# Altium PCB PS-25-001-E-01.PcbDoc (part 1 of 3)
Units mm, origin at the board's own origin, x right, y up, seen from the top; angles counter-clockwise.
Board outline 120 x 60 mm, 4 copper layers (01_Top, 02_Plane, 03_Plane, 04_Bottom), stack 1.578 mm thick; 526 components, 249 nets, 1738 pads, 748 vias.
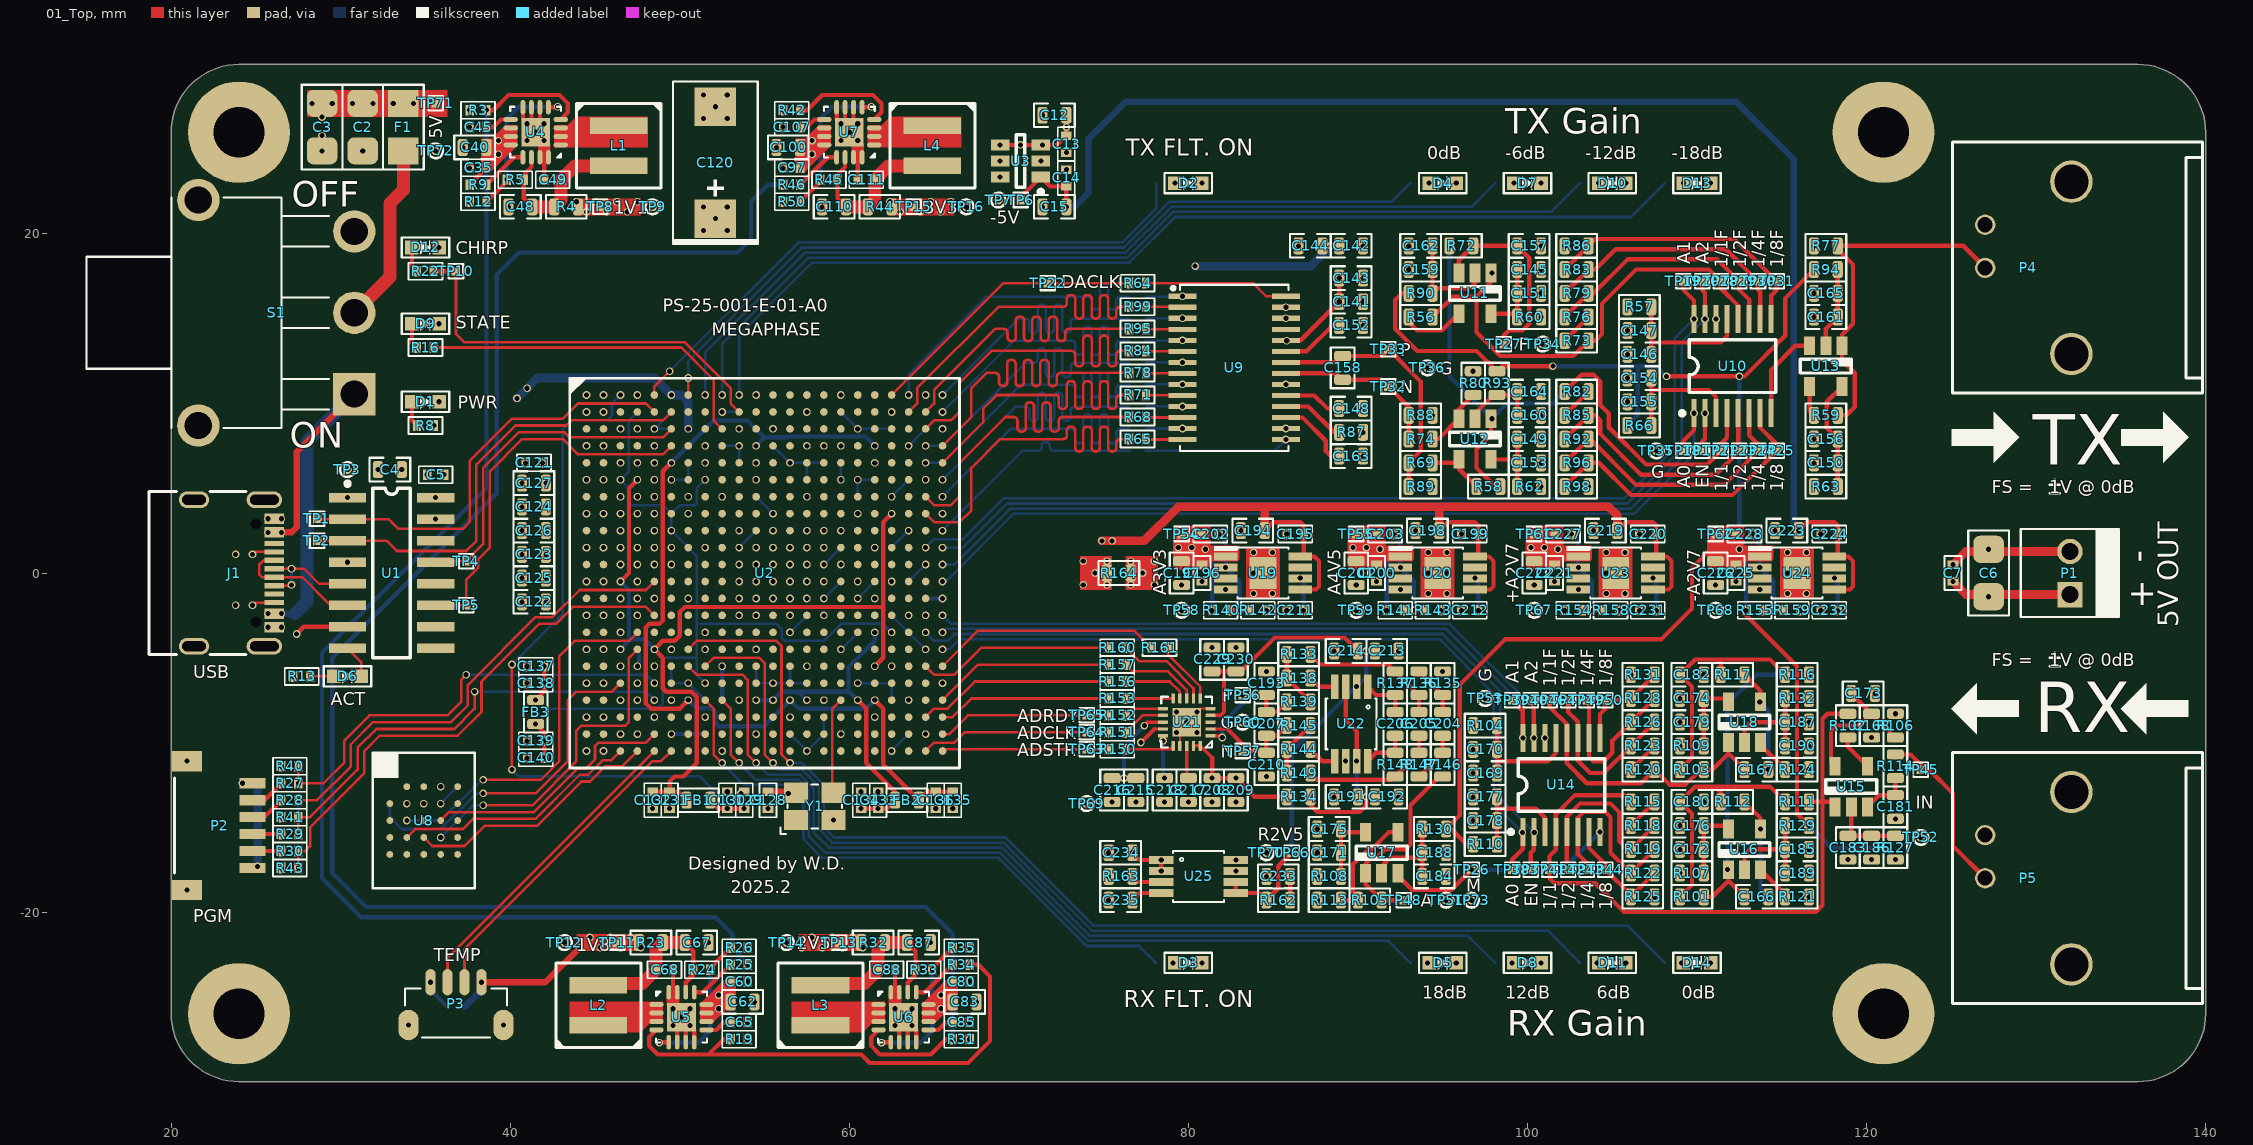
[diagram p0: 01_Top view]
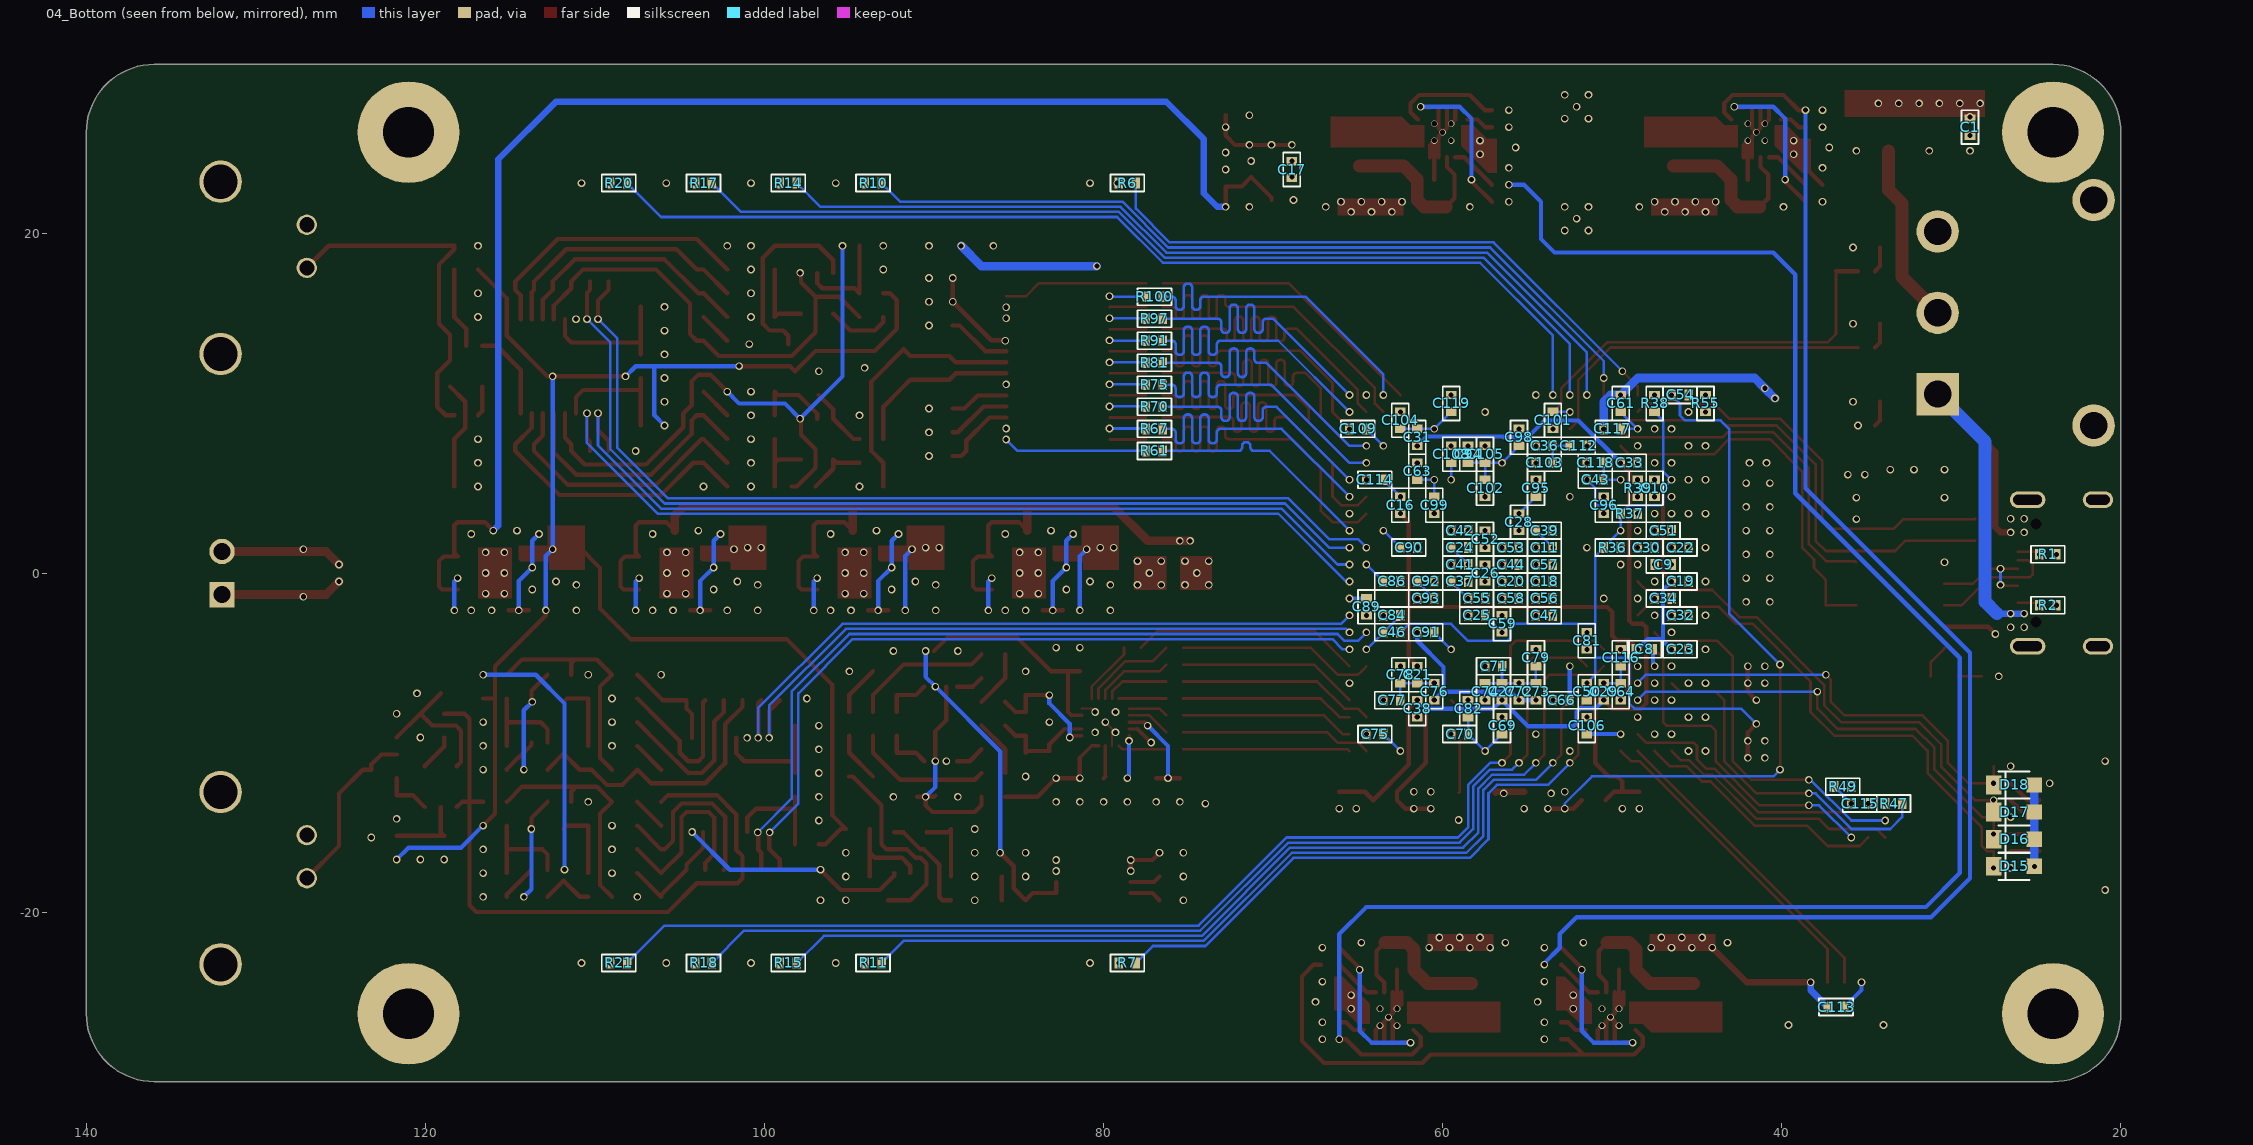
[diagram p1: 04_Bottom view, seen from below]
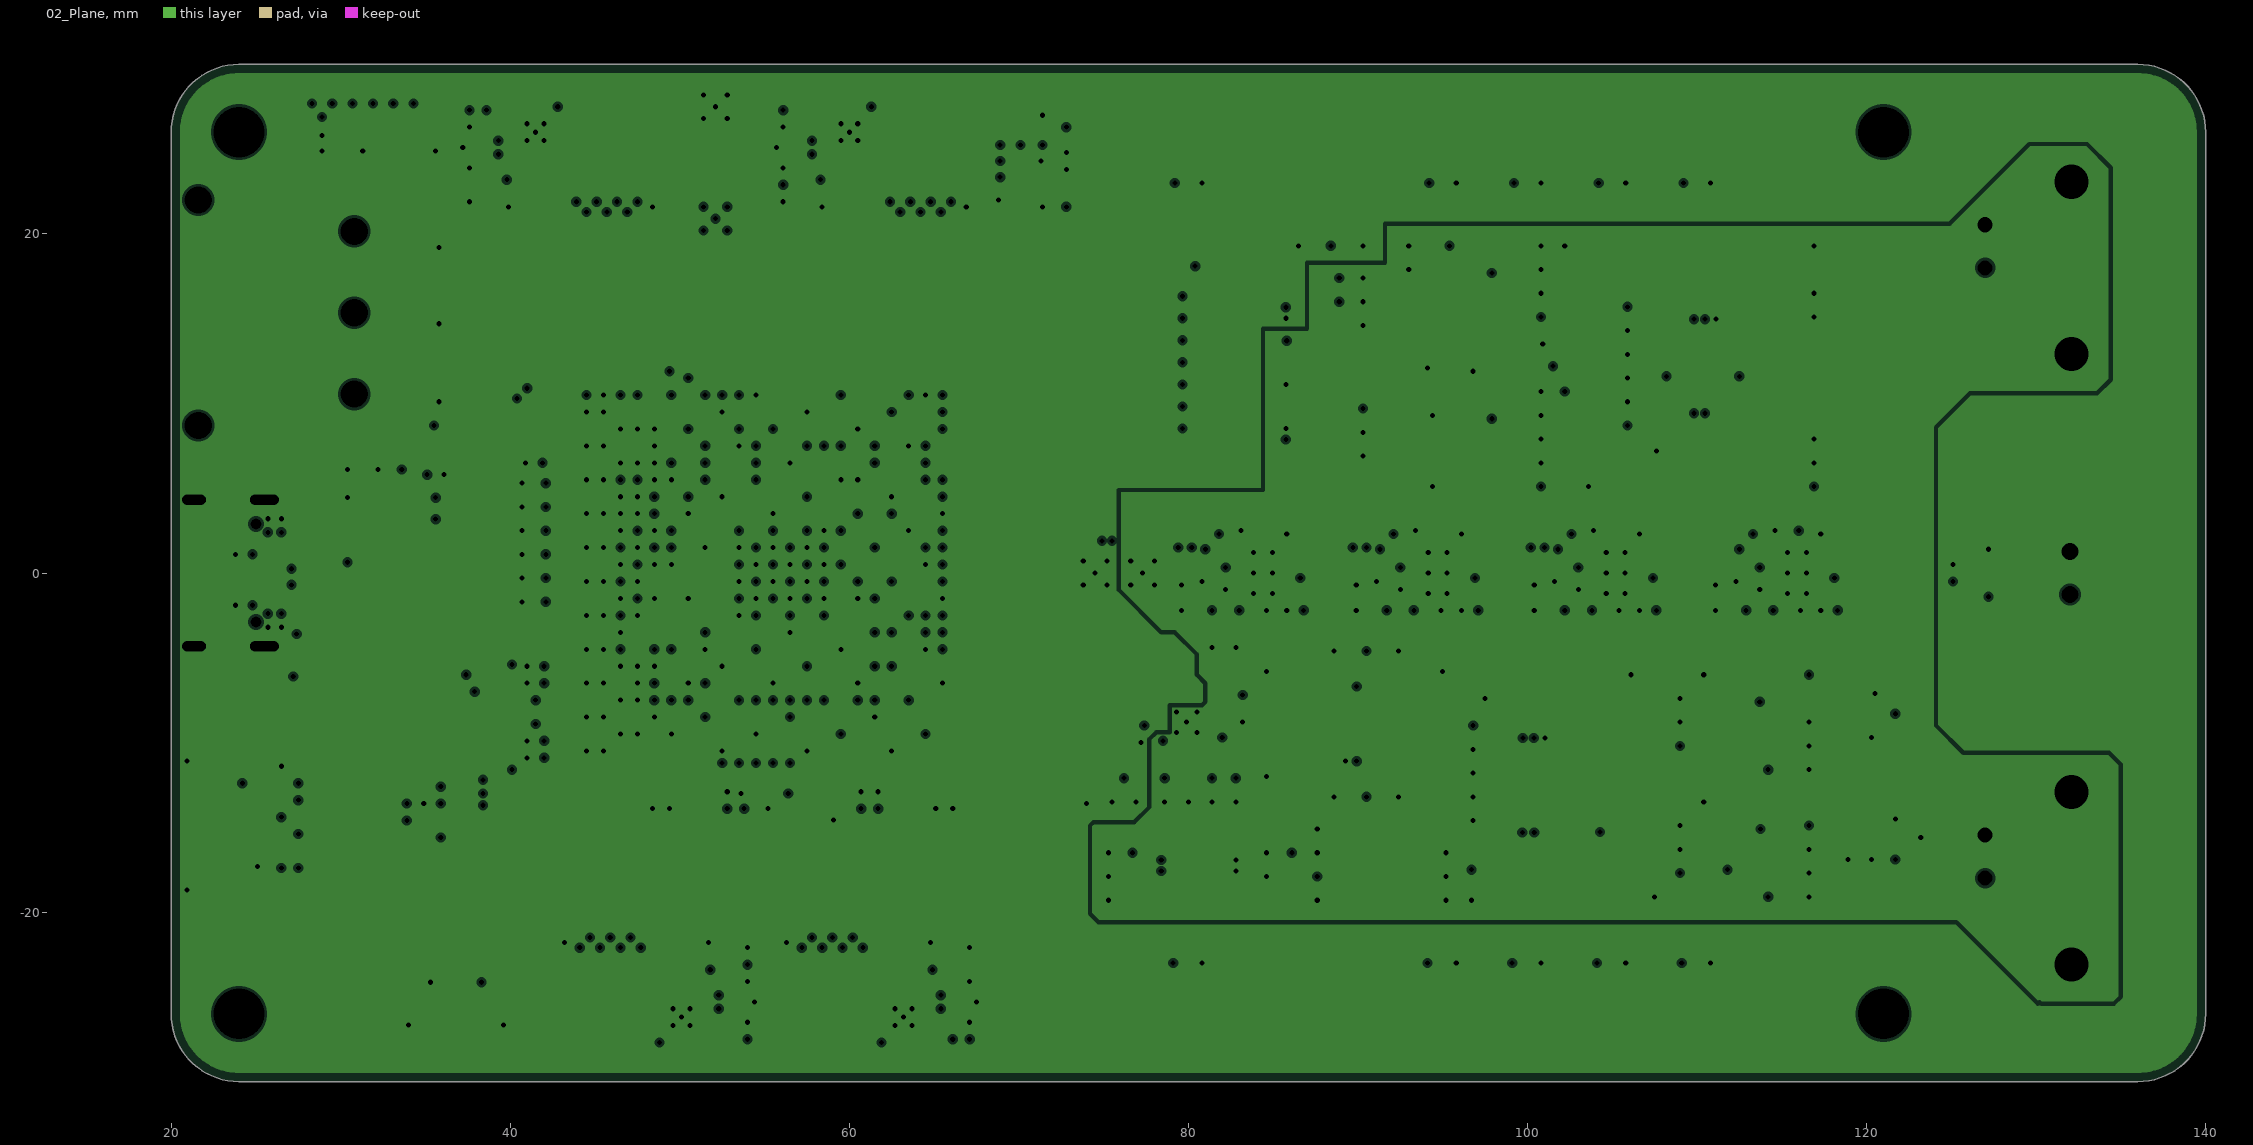
[diagram p2: 02_Plane, clearances drawn from the general rule]
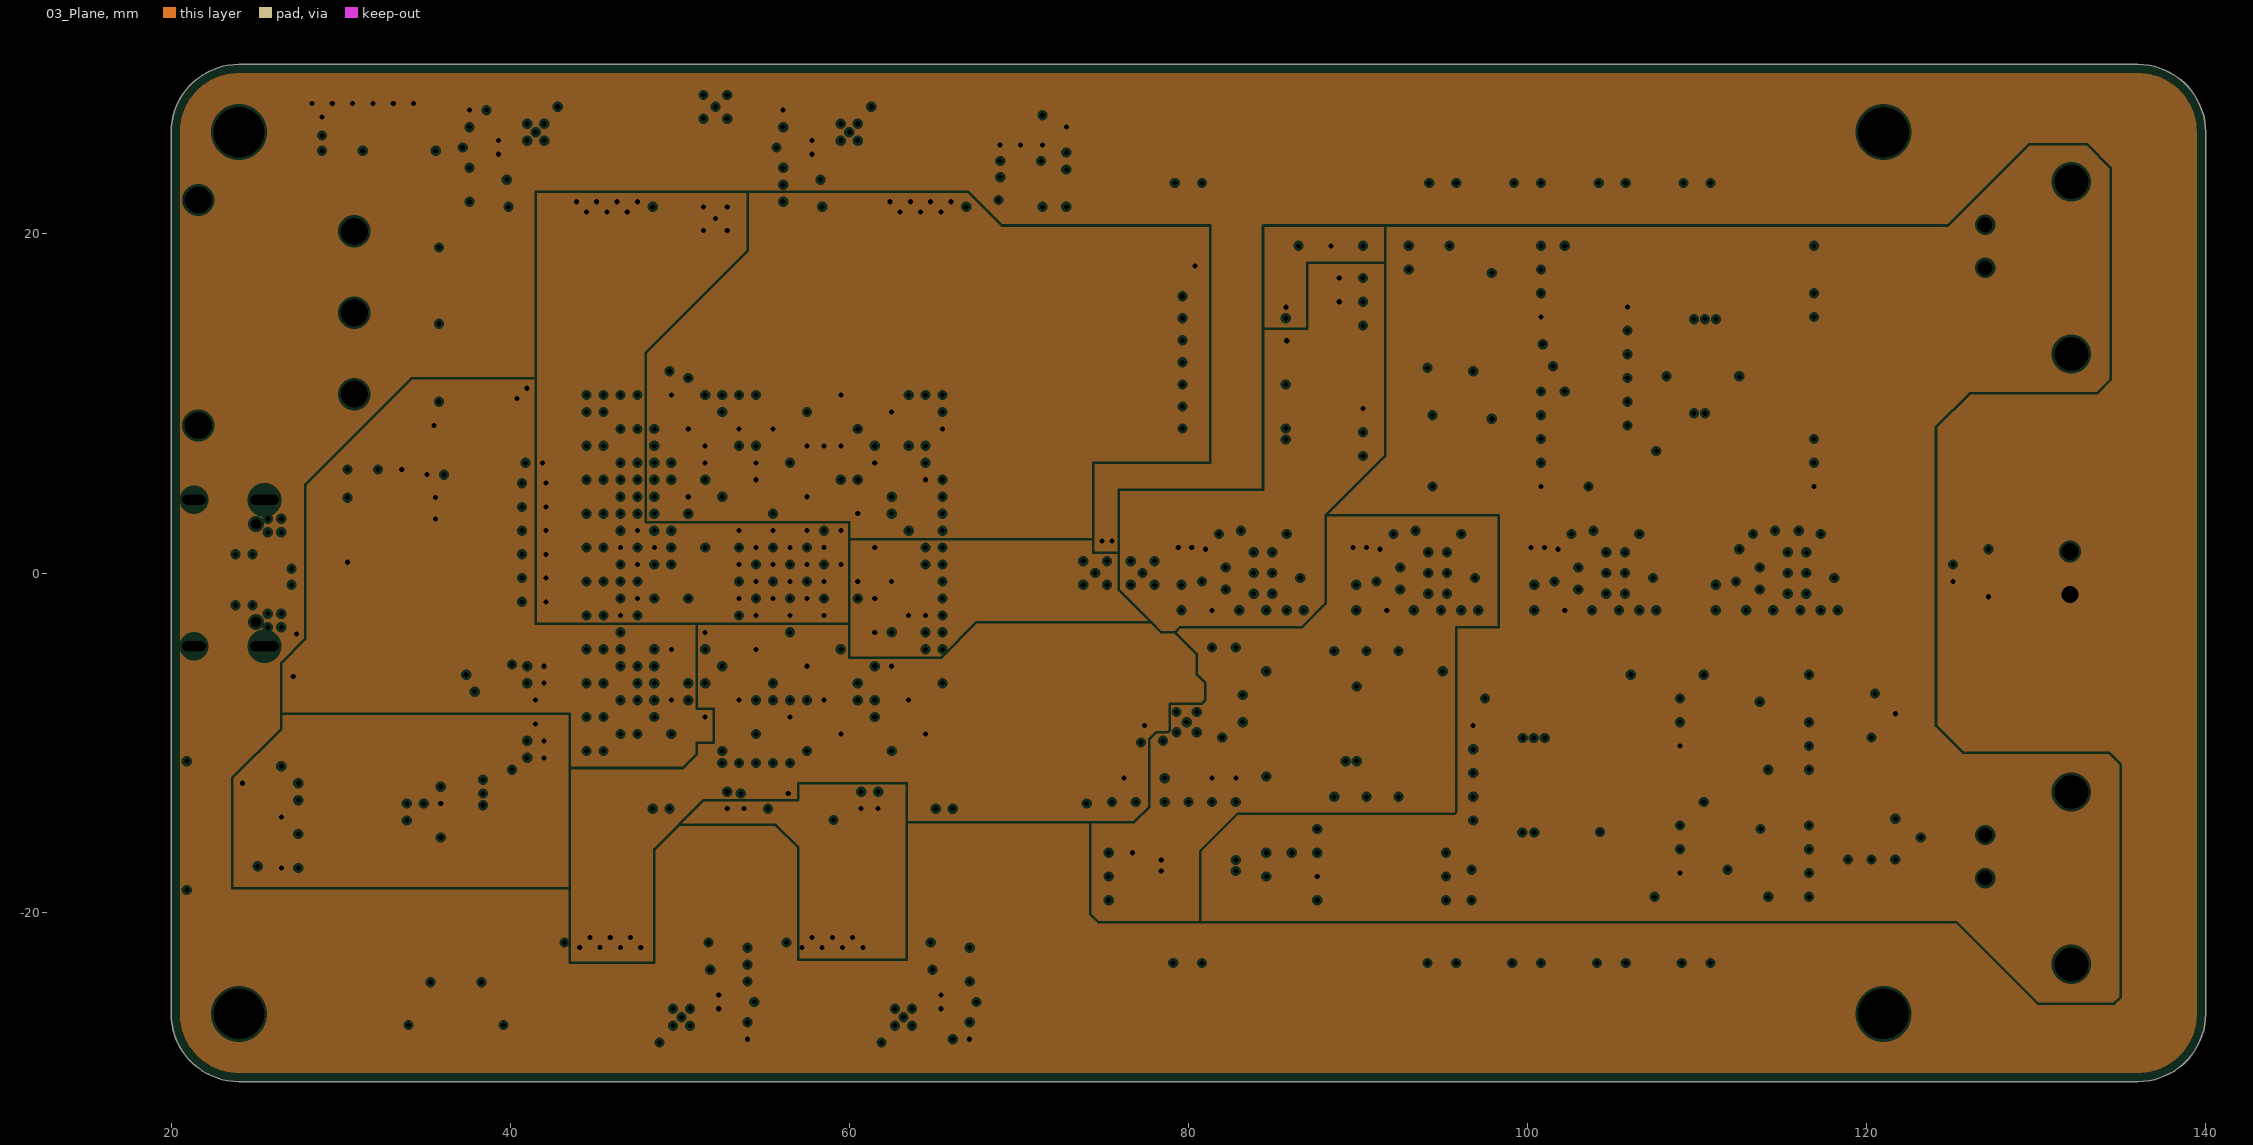
[diagram p3: 03_Plane, clearances drawn from the general rule]
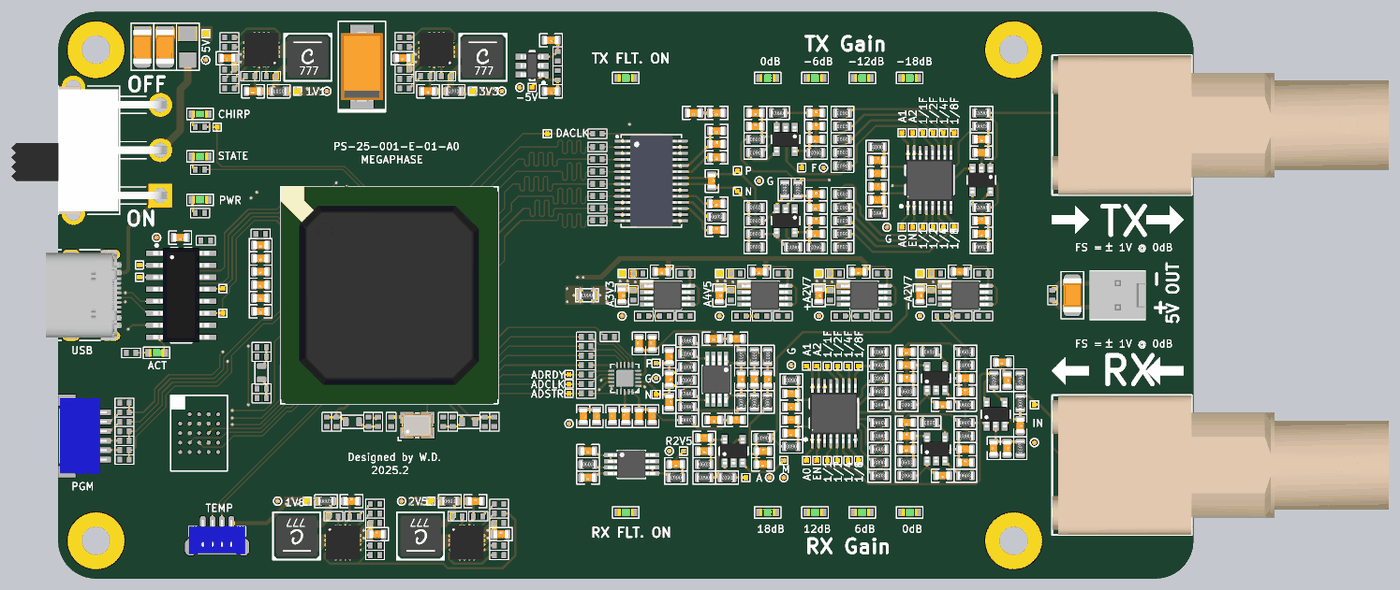
[diagram p6: 3D render of the assembled board from above, using the file's embedded part models]

## Layer stack, top to bottom
Top Solder: solder mask 0.0102, Solder Resist, Dk 3.5
01_Top: signal copper 0.0356
Dielectric 1: core 0.254, FR-4, Dk 4.2
02_Plane: plane copper 0.036, net (Multiple Nets)
Dielectric 3: prepreg 0.927, Dk 4.2
03_Plane: plane copper 0.036, net (Multiple Nets)
Dielectric 4: core 0.254, Dk 4.2
04_Bottom: signal copper 0.0356
Bottom Solder: solder mask 0.0102, Solder Resist, Dk 3.5

## Board outline
20,-26 20,26 cw(c24,26) 24,30 136,30 cw(c136,26) 140,26 140,-26 cw(c136,-26) 136,-30 24,-30 cw(c24,-26)

## Design rules (kind name [scope] priority, off if disabled: settings)
Clearance [All] p1: gap=0.102
ComponentClearance [All] p1 off: gap=0.254 collisioncheckmode=3 verticalgap=0.254 showdistances=FALSE
HoleSize [All] p1: absolutevalues=TRUE maxlimit=10 minlimit=0.025 maxpercent=80.000 minpercent=20.000
MinimumSolderMaskSliver [All] p1 off: minsoldermaskwidth=0.254
PlaneClearance [All] p1: clearance=0.152
PlaneConnect [All] p1: planeconnectstyle=Direct reliefexpansion=0.508 reliefentries=4 reliefconductorwidth=0.254 reliefairgap=0.254
PolygonConnect [All] p1: connectstyle=Direct reliefconductorwidth=0.254 reliefentries=4 polygonreliefangle="90 Angle" airgapwidth=0.254
RoutingVias [All] p1: holewidth=0.3 width=0.45 viastyle="Through Hole" minholewidth=0.2 minwidth=0.3 maxholewidth=1 maxwidth=2
SilkToSilkClearance [All] p1 off: silktosilkclearance=0.254
SilkToSolderMaskClearance [IsPad] p1 off: minsilkscreentomaskgap=0.254 clearancetoexposedcopper=TRUE
SolderMaskExpansion [All] p1: expansion=0.102
Width [All] p1: maxlimit=5.08 minlimit=0.102 preferedwidth=0.254
23 further rules are at their usual default settings.

## Classes and differential pairs
component class 01_Power: C1 C2 C3 C4 C5 C6 C7 C8 C9 C10 C11 C12 C13 C14 C15 C16 C17 C18 C19 C20 C21 C22 C23 C24 C25 C26 C27 C28 C29 C30 C31 C32 C33 C34 C35 C36 C37 C38 C39 C40 C41 C42 C43 C44 C45 C46 C47 C48 C49 C50 C51 C52 C53 C54 C55 C56 C57 C58 C59 C60 C61 C62 C63 C64 C65 C66 C67 C68 C69 C70 C71 C72 C73 C74 C75 C76 C77 C78 C79 C80 C81 C82 C83 C84 C85 C86 C87 C88 C89 C90 C91 C92 C93 C94 C95 C96 C97 C98 C99 C100 C101 C102 C103 C104 C105 C106 C107 C108 C109 C110 C111 C112 C113 C114 C115 C116 C117 C118 C119 C120 C121 C122 C123 C124 C125 C126 C127 C128 C129 C130 C131 C132 C133 C134 C135 C136 C137 C138 C139 C140 D1 D2 D3 D4 D5 D6 D7 D8 D9 D10 D11 D12 D13 D14 D15 D16 D17 D18 F1 FB1 FB2 FB3 J1 L1 L2 L3 L4 P1 P2 P3 R1 R2 R3 R4 R5 R6 R7 R8 R9 R10 R11 R12 R13 R14 R15 R16 R17 R18 R19 R20 R21 R22 R23 R24 R25 R26 R27 R28 R29 R30 R31 R32 R33 R34 R35 R36 R37 R38 R39 R40 R41 R42 R43 R44 R45 R46 R47 R49 R50 R55 S1 TP1 TP2 TP3 TP4 TP5 TP6 TP7 TP8 TP9 TP10 TP11 TP12 TP13 TP14 TP15 TP16 TP71 TP72 U1 U3 U4 U5 U6 U7 U8 Y1
component class 02_Analog: C141 C142 C143 C144 C145 C146 C147 C148 C149 C150 C151 C152 C153 C154 C155 C156 C157 C158 C159 C160 C161 C162 C163 C164 C165 C166 C167 C168 C169 C170 C171 C172 C173 C174 C175 C176 C177 C178 C179 C180 C181 C182 C183 C184 C185 C186 C187 C188 C189 C190 C191 C192 C193 C194 C195 C196 C197 C198 C199 C200 C201 C202 C203 C204 C205 C206 C207 C208 C209 C210 C211 C212 C213 C214 C215 C216 C217 C218 C219 C220 C221 C222 C223 C224 C225 C226 C227 C228 C229 C230 C231 C232 C233 C234 C235 P4 P5 R56 R57 R58 R59 R60 R61 R62 R63 R64 R65 R66 R67 R68 R69 R70 R71 R72 R73 R74 R75 R76 R77 R78 R79 R80 R81 R82 R83 R84 R85 R86 R87 R88 R89 R90 R91 R92 R93 R94 R95 R96 R97 R98 R99 R100 R101 R102 R103 R104 R105 R106 R107 R108 R109 R110 R111 R112 R113 R114 R115 R116 R117 R118 R119 R120 R121 R122 R123 R124 R125 R126 R127 R128 R129 R130 R131 R132 R133 R134 R135 R136 R137 R138 R139 R140 R141 R142 R143 R144 R145 R146 R147 R148 R149 R150 R151 R152 R153 R154 R155 R156 R157 R158 R159 R160 R161 R162 R163 R164 TP17 TP18 TP19 TP20 TP21 TP22 TP23 TP24 TP25 TP26 TP27 TP28 TP29 TP30 TP31 TP32 TP33 TP34 TP35 TP36 TP37 TP38 TP39 TP40 TP41 TP42 TP43 TP44 TP45 TP46 TP47 TP48 TP49 TP50 TP51 TP52 TP53 TP54 TP55 TP56 TP57 TP58 TP59 TP60 TP61 TP62 TP63 TP64 TP65 TP66 TP67 TP68 TP69 TP70 TP73 U9 U10 U11 U12 U13 U14 U15 U16 U17 U18 U19 U20 U21 U22 U23 U24 U25
component class 03_IO: U2
net class DA_DATA: DA_CLK DA_D0 DA_D1 DA_D2 DA_D3 DA_D4 DA_D5 DA_D6 DA_D7 DA_D8 DA_D9 DA_D10 DA_D11 DA_D12 DA_D13 DA_PD

## Components (designator, comment, footprint, x,y, rotation, side; value= is the part's Value field where it differs from the comment)
C1 "0.1uF" 1005[0402]CAP 28.9,26.3 r90 bottom
C2 "220uF/6.3V  1206" 1206CAP 31.3,26.3 r90 top
C3 "220uF/6.3V  1206" 1206CAP 28.9,26.3 r90 top
C4 "10uF/10V 0603" 1608[0603]CAP 32.9,6.1 r180 top
C5 "0.1uF" 1005[0402]CAP 35.6,5.8 r180 top
C6 "220uF/6.3V  1206" 1206CAP 127.2,0 r270 top
C7 "0.1uF" 1005[0402]CAP 125.1,0 r270 top
C8 "0.1uF" 1005[0402]CAP 48.1,-4.5 r0 bottom
C9 "0.1uF" 1005[0402]CAP 47,0.5 r0 bottom
C10 "0.1uF" 1005[0402]CAP 47.5,5 r90 bottom
C11 "0.1uF" 1005[0402]CAP 54,1.5 r0 bottom
C12 "22uF/10V 0603" 1608[0603]CAP 72.1,27 r180 top
C13 "0.1uF" 1005[0402]CAP 72.8,25.3 r90 top
C14 "0.1uF" 1005[0402]CAP 72.8,23.3 r270 top
C15 "22uF/10V 0603" 1608[0603]CAP 72.1,21.6 r180 top
C16 "0.1uF" 1005[0402]CAP 62.5,4 r270 bottom
C17 "1uF" 1005[0402]CAP 68.9,23.8 r90 bottom
C18 "0.1uF" 1005[0402]CAP 54,-0.5 r0 bottom
C19 "0.1uF" 1005[0402]CAP 46,-0.5 r0 bottom
C20 "0.1uF" 1005[0402]CAP 56,-0.5 r0 bottom
C21 "0.1uF" 1005[0402]CAP 61.5,-6 r90 bottom
C22 "0.1uF" 1005[0402]CAP 46,1.5 r0 bottom
C23 "0.1uF" 1005[0402]CAP 46,-4.5 r0 bottom
C24 "0.1uF" 1005[0402]CAP 59,1.5 r180 bottom
C25 "0.1uF" 1005[0402]CAP 58,-2.5 r0 bottom
C26 "0.1uF" 1005[0402]CAP 57.5,0 r90 bottom
C27 "0.1uF" 1005[0402]CAP 56.5,-7 r270 bottom
C28 "0.1uF" 1005[0402]CAP 55.5,3 r270 bottom
C29 "0.1uF" 1005[0402]CAP 50.5,-7 r270 bottom
C30 "0.1uF" 1005[0402]CAP 48,1.5 r0 bottom
C31 "0.1uF" 1005[0402]CAP 61.5,8 r270 bottom
C32 "0.1uF" 1005[0402]CAP 46,-2.5 r0 bottom
C33 "0.1uF" 1005[0402]CAP 49,6.5 r0 bottom
C34 "0.1uF" 1005[0402]CAP 47,-1.5 r0 bottom
C35 "0.1uF" 1005[0402]CAP 38.1,23.9 r180 top
C36 "0.1uF" 1005[0402]CAP 54,7.5 r0 bottom
C37 "0.1uF" 1005[0402]CAP 59,-0.5 r180 bottom
C38 "0.1uF" 1005[0402]CAP 61.5,-8 r90 bottom
C39 "0.1uF" 1005[0402]CAP 54,2.5 r180 bottom
C40 "10uF/10V 0603" 1608[0603]CAP 37.9,25.1 r180 top
C41 "0.1uF" 1005[0402]CAP 59,0.5 r0 bottom
C42 "0.1uF" 1005[0402]CAP 59,2.5 r0 bottom
C43 "0.1uF" 1005[0402]CAP 51,5.5 r0 bottom
C44 "0.1uF" 1005[0402]CAP 56,0.5 r180 bottom
C45 "3.3nF" 1005[0402]CAP 38.1,26.3 r180 top
C46 "0.1uF" 1005[0402]CAP 63,-3.5 r180 bottom
C47 "0.1uF" 1005[0402]CAP 54,-2.5 r0 bottom
C48 "22uF/10V 0603" 1608[0603]CAP 40.6,21.6 r180 top
C49 "0.1uF" 1005[0402]CAP 42.5,23.2 r0 top
C50 "0.1uF" 1005[0402]CAP 51.5,-7 r90 bottom
C51 "0.1uF" 1005[0402]CAP 47,2.5 r0 bottom
C52 "0.1uF" 1005[0402]CAP 57.5,2 r90 bottom
C53 "0.1uF" 1005[0402]CAP 56,1.5 r0 bottom
C54 "0.1uF" 1005[0402]CAP 46,10.5 r0 bottom
C55 "0.1uF" 1005[0402]CAP 58,-1.5 r180 bottom
C56 "0.1uF" 1005[0402]CAP 54,-1.5 r180 bottom
C57 "0.1uF" 1005[0402]CAP 54,0.5 r180 bottom
C58 "0.1uF" 1005[0402]CAP 56,-1.5 r180 bottom
C59 "0.1uF" 1005[0402]CAP 56.5,-3 r90 bottom
C60 "0.1uF" 1005[0402]CAP 53.5,-24.1 r0 top
C61 "0.1uF" 1005[0402]CAP 49.5,10 r90 bottom
C62 "10uF/10V 0603" 1608[0603]CAP 53.7,-25.3 r0 top
C63 "0.1uF" 1005[0402]CAP 61.5,6 r90 bottom
C64 "0.1uF" 1005[0402]CAP 49.5,-7 r270 bottom
C65 "3.3nF" 1005[0402]CAP 53.5,-26.5 r0 top
C66 "0.1uF" 1005[0402]CAP 53,-7.5 r0 bottom
C67 "22uF/10V 0603" 1608[0603]CAP 51,-21.8 r0 top
C68 "0.1uF" 1005[0402]CAP 49.1,-23.4 r180 top
C69 "0.1uF" 1005[0402]CAP 56.5,-9 r90 bottom
C70 "0.1uF" 1005[0402]CAP 59,-9.5 r0 bottom
C71 "0.1uF" 1005[0402]CAP 57,-5.5 r0 bottom
C72 "0.1uF" 1005[0402]CAP 55.5,-7 r270 bottom
C73 "0.1uF" 1005[0402]CAP 54.5,-7 r270 bottom
C74 "0.1uF" 1005[0402]CAP 57.5,-7 r270 bottom
C75 "0.1uF" 1005[0402]CAP 64,-9.5 r0 bottom
C76 "0.1uF" 1005[0402]CAP 60.5,-7 r270 bottom
C77 "0.1uF" 1005[0402]CAP 63,-7.5 r0 bottom
C78 "0.1uF" 1005[0402]CAP 62.5,-6 r90 bottom
C79 "0.1uF" 1005[0402]CAP 54.5,-5 r90 bottom
C80 "0.1uF" 1005[0402]CAP 66.6,-24.1 r0 top
C81 "0.1uF" 1005[0402]CAP 51.5,-4 r90 bottom
C82 "0.1uF" 1005[0402]CAP 58.5,-8 r90 bottom
C83 "10uF/10V 0603" 1608[0603]CAP 66.8,-25.3 r0 top
C84 "0.1uF" 1005[0402]CAP 63,-2.5 r0 bottom
C85 "3.3nF" 1005[0402]CAP 66.6,-26.5 r0 top
C86 "0.1uF" 1005[0402]CAP 63,-0.5 r180 bottom
C87 "22uF/10V 0603" 1608[0603]CAP 64.1,-21.8 r0 top
C88 "0.1uF" 1005[0402]CAP 62.2,-23.4 r180 top
C89 "0.1uF" 1005[0402]CAP 64.5,-2 r270 bottom
C90 "0.1uF" 1005[0402]CAP 62,1.5 r180 bottom
C91 "0.1uF" 1005[0402]CAP 61,-3.5 r0 bottom
C92 "0.1uF" 1005[0402]CAP 61,-0.5 r180 bottom
C93 "0.1uF" 1005[0402]CAP 61,-1.5 r0 bottom
C94 "0.1uF" 1005[0402]CAP 58.5,7 r90 bottom
C95 "0.1uF" 1005[0402]CAP 54.5,5 r90 bottom
C96 "0.1uF" 1005[0402]CAP 50.5,4 r90 bottom
C97 "0.1uF" 1005[0402]CAP 56.6,23.9 r180 top
C98 "0.1uF" 1005[0402]CAP 55.5,8 r90 bottom
C99 "0.1uF" 1005[0402]CAP 60.5,4 r270 bottom
C100 "10uF/10V 0603" 1608[0603]CAP 56.4,25.1 r180 top
C101 "0.1uF" 1005[0402]CAP 53.5,9 r270 bottom
C102 "0.1uF" 1005[0402]CAP 57.5,5 r270 bottom
C103 "0.1uF" 1005[0402]CAP 54,6.5 r0 bottom
C104 "0.1uF" 1005[0402]CAP 62.5,9 r90 bottom
C105 "0.1uF" 1005[0402]CAP 57.5,7 r90 bottom
C106 "0.1uF" 1005[0402]CAP 51.5,-9 r90 bottom
C107 "3.3nF" 1005[0402]CAP 56.6,26.3 r180 top
C108 "0.1uF" 1005[0402]CAP 59.5,7 r90 bottom
C109 "0.1uF" 1005[0402]CAP 65,8.5 r0 bottom
C110 "22uF/10V 0603" 1608[0603]CAP 59.1,21.6 r180 top
C111 "0.1uF" 1005[0402]CAP 61,23.2 r0 top
C112 "0.1uF" 1005[0402]CAP 52,7.5 r180 bottom
C113 "0.1uF" 1005[0402]CAP 36.8,-25.6 r0 bottom
C114 "0.1uF" 1005[0402]CAP 64,5.5 r0 bottom
C115 "0.1uF" 1005[0402]CAP 35.4,-13.6 r0 bottom
C116 "0.1uF" 1005[0402]CAP 49.5,-5 r90 bottom
C117 "0.1uF" 1005[0402]CAP 50,8.5 r0 bottom
C118 "0.1uF" 1005[0402]CAP 51,6.5 r0 bottom
C119 "0.1uF" 1005[0402]CAP 59.5,10 r90 bottom
C120 "EEFGX0E471R" TE 52.1,24.2 r90 top
C121 "0.1uF" 1005[0402]CAP 41.4,6.5 r0 top
C122 "10uF/10V 0603" 1608[0603]CAP 41.4,-1.7 r180 top
C123 "10uF/10V 0603" 1608[0603]CAP 41.4,1.1 r180 top
C124 "10uF/10V 0603" 1608[0603]CAP 41.4,3.9 r180 top
C125 "10uF/10V 0603" 1608[0603]CAP 41.4,-0.3 r180 top
C126 "10uF/10V 0603" 1608[0603]CAP 41.4,2.5 r180 top
C127 "10uF/10V 0603" 1608[0603]CAP 41.4,5.3 r180 top
C128 "0.1uF" 1005[0402]CAP 55.2,-13.4 r270 top
C129 "1uF/10V" 1005[0402]CAP 53.8,-13.4 r90 top
C130 "0.1uF" 1005[0402]CAP 52.8,-13.4 r270 top
C131 "1uF/10V" 1005[0402]CAP 49.4,-13.4 r270 top
C132 "0.1uF" 1005[0402]CAP 48.4,-13.4 r90 top
C133 "1uF/10V" 1005[0402]CAP 61.7,-13.4 r90 top
C134 "0.1uF" 1005[0402]CAP 60.7,-13.4 r270 top
C135 "1uF/10V" 1005[0402]CAP 66.1,-13.4 r270 top
C136 "0.1uF" 1005[0402]CAP 65.1,-13.4 r90 top
C137 "1uF/10V" 1005[0402]CAP 41.5,-5.5 r180 top
C138 "0.1uF" 1005[0402]CAP 41.5,-6.5 r0 top
C139 "1uF/10V" 1005[0402]CAP 41.5,-9.9 r180 top
C140 "0.1uF" 1005[0402]CAP 41.5,-10.9 r0 top
C141 "10uF/10V 0603" 1608[0603]CAP 89.6,16 r0 top
C142 "10uF/10V 0603" 1608[0603]CAP 89.6,19.3 r180 top
C143 "0.1uF 0603" 1608[0603]CAP 89.6,17.4 r180 top
C144 "0.1uF 0603" 1608[0603]CAP 87.2,19.3 r180 top
C145 "10uF/10V 0603" 1608[0603]CAP 100.1,17.9 r0 top
C146 "0.1uF 0603" 1608[0603]CAP 106.6,12.9 r180 top
C147 "10uF/10V 0603" 1608[0603]CAP 106.6,14.3 r0 top
C148 "0.1uF 0603" 1608[0603]CAP 89.6,9.7 r180 top
C149 "10uF/10V 0603" 1608[0603]CAP 100.1,7.9 r0 top
C150 "10uF/10V 0603" 1608[0603]CAP 117.6,6.5 r180 top
C151 "0.1uF 0603" 1608[0603]CAP 100.1,16.5 r180 top
C152 "0.1uF 0603" 1608[0603]CAP 89.6,14.6 r180 top
C153 "0.1uF 0603" 1608[0603]CAP 100.1,6.5 r180 top
C154 "0.1uF 0603" 1608[0603]CAP 106.6,11.5 r0 top
C155 "10uF/10V 0603" 1608[0603]CAP 106.6,10.1 r180 top
C156 "0.1uF 0603" 1608[0603]CAP 117.6,7.9 r0 top
C157 "1nF 0603" 1608[0603]CAP 100.1,19.3 r0 top
C158 "DNI" 1608[0603]CAP 89.1,12.1 r270 top
C159 "0.1uF 0603" 1608[0603]CAP 93.7,17.9 r0 top
C160 "0.1uF 0603" 1608[0603]CAP 100.1,9.3 r180 top
C161 "0.1uF 0603" 1608[0603]CAP 117.6,15.1 r0 top
C162 "10uF/10V 0603" 1608[0603]CAP 93.7,19.3 r180 top
C163 "0.1uF 0603" 1608[0603]CAP 89.6,6.9 r0 top
C164 "10uF/10V 0603" 1608[0603]CAP 100.1,10.7 r0 top
C165 "10uF/10V 0603" 1608[0603]CAP 117.6,16.5 r180 top
C166 "5.1nF C0G 0603" 1608[0603]CAP 113.5,-19.1 r180 top
C167 "5.1nF C0G 0603" 1608[0603]CAP 113.5,-11.6 r180 top
C168 "10uF/10V 0603" 1608[0603]CAP 120.3,-9 r270 top
C169 "0.1uF 0603" 1608[0603]CAP 97.5,-11.8 r180 top
C170 "10uF/10V 0603" 1608[0603]CAP 97.5,-10.4 r0 top
C171 "10uF/10V 0603" 1608[0603]CAP 88.3,-16.5 r180 top
C172 "10uF/10V 0603" 1608[0603]CAP 109.7,-16.3 r180 top
C173 "0.1uF 0603" 1608[0603]CAP 119.8,-7.1 r180 top
C174 "10uF/10V 0603" 1608[0603]CAP 109.7,-7.4 r180 top
C175 "0.1uF 0603" 1608[0603]CAP 88.3,-15.1 r0 top
C176 "0.1uF 0603" 1608[0603]CAP 109.7,-14.9 r0 top
C177 "0.1uF 0603" 1608[0603]CAP 97.5,-13.2 r0 top
C178 "10uF/10V 0603" 1608[0603]CAP 97.5,-14.6 r180 top
C179 "0.1uF 0603" 1608[0603]CAP 109.7,-8.8 r0 top
C180 "24nF C0G 0603" 1608[0603]CAP 109.7,-13.5 r180 top
C181 "DNI" 1608[0603]CAP 121.7,-13.8 r270 top
C182 "24nF C0G 0603" 1608[0603]CAP 109.7,-6 r180 top
C183 "0.1uF 0603" 1608[0603]CAP 118.9,-16.2 r90 top
C184 "0.1uF 0603" 1608[0603]CAP 94.5,-17.9 r180 top
C185 "0.1uF 0603" 1608[0603]CAP 115.9,-16.3 r180 top
C186 "10uF/10V 0603" 1608[0603]CAP 120.3,-16.2 r270 top
C187 "0.1uF 0603" 1608[0603]CAP 115.9,-8.8 r180 top
C188 "10uF/10V 0603" 1608[0603]CAP 94.5,-16.5 r0 top
C189 "10uF/10V 0603" 1608[0603]CAP 115.9,-17.7 r0 top
C190 "10uF/10V 0603" 1608[0603]CAP 115.9,-10.2 r0 top
C191 "0.1uF 0603" 1608[0603]CAP 89.3,-13.2 r180 top
C192 "10uF/10V 0603" 1608[0603]CAP 91.7,-13.2 r0 top
C193 "220pF 0603" 1608[0603]CAP 84.6,-6.5 r270 top
C194 "22uF/10V 0603" 1608[0603]CAP 83.8,2.5 r180 top
C195 "0.1uF" 1005[0402]CAP 86.3,2.3 r0 top
C196 "0.1uF" 1005[0402]CAP 80.8,0 r90 top
C197 "22uF/10V 0603" 1608[0603]CAP 79.6,0 r270 top
C198 "22uF/10V 0603" 1608[0603]CAP 94.1,2.5 r180 top
C199 "0.1uF" 1005[0402]CAP 96.6,2.3 r0 top
C200 "0.1uF" 1005[0402]CAP 91.1,0 r90 top
C201 "22uF/10V 0603" 1608[0603]CAP 89.9,0 r270 top
C202 "10nF" 1005[0402]CAP 81.3,2.3 r180 top
C203 "10nF" 1005[0402]CAP 91.6,2.3 r180 top
C204 "220pF 0603" 1608[0603]CAP 95,-8.9 r270 top
C205 "330pF 0603" 1608[0603]CAP 93.6,-8.9 r270 top
C206 "470pF 0603" 1608[0603]CAP 92.2,-8.9 r270 top
C207 "2.2nF 0603" 1608[0603]CAP 84.6,-8.9 r270 top
C208 "10uF/10V 0603" 1608[0603]CAP 81.4,-12.8 r270 top
C209 "0.1uF 0603" 1608[0603]CAP 82.8,-12.8 r270 top
C210 "220pF 0603" 1608[0603]CAP 84.6,-11.3 r270 top
C211 "10nF" 1005[0402]CAP 86.3,-2.2 r0 top
C212 "10nF" 1005[0402]CAP 96.6,-2.2 r0 top
C213 "10uF/10V 0603" 1608[0603]CAP 91.7,-4.6 r0 top
C214 "0.1uF 0603" 1608[0603]CAP 89.3,-4.6 r180 top
C215 "10uF/10V 0603" 1608[0603]CAP 76.9,-12.8 r270 top
C216 "0.1uF 0603" 1608[0603]CAP 75.5,-12.8 r270 top
C217 "1uF/10V 0603" 1608[0603]CAP 80,-12.8 r90 top
C218 "1uF/10V 0603" 1608[0603]CAP 78.6,-12.8 r90 top
C219 "22uF/10V 0603" 1608[0603]CAP 104.6,2.5 r180 top
C220 "0.1uF" 1005[0402]CAP 107.1,2.3 r0 top
C221 "0.1uF" 1005[0402]CAP 101.6,0 r90 top
C222 "22uF/10V 0603" 1608[0603]CAP 100.4,0 r270 top
C223 "22uF/10V 0603" 1608[0603]CAP 115.3,2.5 r180 top
C224 "0.1uF" 1005[0402]CAP 117.8,2.3 r0 top
C225 "0.1uF" 1005[0402]CAP 112.3,0 r90 top
C226 "22uF/10V 0603" 1608[0603]CAP 111.1,0 r270 top
C227 "10nF" 1005[0402]CAP 102.1,2.3 r180 top
C228 "10nF" 1005[0402]CAP 112.8,2.3 r180 top
C229 "10uF/10V 0603" 1608[0603]CAP 81.4,-5.1 r90 top
C230 "0.1uF 0603" 1608[0603]CAP 82.8,-5.1 r90 top
C231 "10nF" 1005[0402]CAP 107.1,-2.2 r0 top
C232 "10nF" 1005[0402]CAP 117.8,-2.2 r0 top
C233 "22uF/10V 0603" 1608[0603]CAP 85.3,-17.9 r180 top
C234 "10uF/10V 0603" 1608[0603]CAP 76,-16.5 r180 top
C235 "1uF/10V 0603" 1608[0603]CAP 76,-19.3 r180 top
D1 "Yellow Green LED" 1608[0603]LED 35,10.1 r0 top
D2 "Blue LED" 1608[0603]LED 80,23 r0 top
D3 "Blue LED" 1608[0603]LED 80,-23 r0 top
D4 "Yellow Green LED" 1608[0603]LED 95,23 r0 top
D5 "Yellow Green LED" 1608[0603]LED 95,-23 r0 top
D6 "Yellow Green LED" 1608[0603]LED 30.4,-6.1 r0 top
D7 "Yellow Green LED" 1608[0603]LED 100,23 r0 top
D8 "Yellow Green LED" 1608[0603]LED 100,-23 r0 top
D9 "Yellow Green LED" 1608[0603]LED 35,14.7 r0 top
D10 "Yellow Green LED" 1608[0603]LED 105,23 r0 top
D11 "Yellow Green LED" 1608[0603]LED 105,-23 r0 top
D12 "Red LED" 1608[0603]LED 35,19.2 r0 top
D13 "Yellow Green LED" 1608[0603]LED 110,23 r0 top
D14 "Yellow Green LED" 1608[0603]LED 110,-23 r0 top
D15 "DZ2J033M0L" SC-90A 25.1,-17.3 r90 bottom
D16 "DZ2J033M0L" SC-90A 25.1,-15.7 r90 bottom
D17 "DZ2J033M0L" SC-90A 25.1,-14.1 r90 bottom
D18 "DZ2J033M0L" SC-90A 25.1,-12.5 r90 bottom
F1 "BSMD1206C-1200T" 1206 33.7,26.3 r90 top
FB1 "MPZ1608S221A" 1608[0603]FB 51.1,-13.4 r180 top
FB2 "MPZ1608S221A" 1608[0603]FB 63.4,-13.4 r0 top
FB3 "MPZ1608S221A" 1608[0603]FB 41.5,-8.2 r270 top
J1 "KY-TYPE-C-16P" USBTypeC 25,0 r270 top
L1 "XFL4020-222MEB" XFL4020 46.4,25.2 r270 top
L2 "XFL4020-222MEB" XFL4020 45.2,-25.5 r90 top
L3 "XFL4020-222MEB" XFL4020 58.3,-25.5 r90 top
L4 "XFL4020-222MEB" XFL4020 64.9,25.2 r270 top
P1 "Header 2" KEF2510_2P 132,0 r90 top
P2 "BM06B-SRSS-TB" SM06B-SRSS-TB 24.8,-12.4 r270 top
P3 "BM04B-SRSS-TB" BM04B-SRSS-TB 36.8,-25.4 r180 top
P4 "5227661-1" BNC_5227661-1 139.83,18 r270 top
P5 "5227661-1" BNC_5227661-1 139.83,-18 r270 top
R1 "5.1K" 1005[0402]RES 24.3,1.1 r180 bottom
R2 "5.1K" 1005[0402]RES 24.3,-1.9 r0 bottom
R3 "1K" 1005[0402]RES 38.1,27.3 r0 top
R4 "0R 0603" 1608[0603]RES 43.3,21.6 r180 top
R5 "374R" 1005[0402]RES 40.3,23.2 r0 top
R6 "1K" 1005[0402]RES 78.6,23 r180 bottom
R7 "1K" 1005[0402]RES 78.6,-23 r180 bottom
R8 "1K" 1005[0402]RES 35,8.7 r0 top
R9 "10K" 1005[0402]RES 38.1,22.9 r0 top
R10 "1K" 1005[0402]RES 93.6,23 r180 bottom
R11 "1K" 1005[0402]RES 93.6,-23 r180 bottom
R12 "1K" 1005[0402]RES 38.1,21.9 r0 top
R13 "1K" 1005[0402]RES 27.7,-6.1 r180 top
R14 "1K" 1005[0402]RES 98.6,23 r180 bottom
R15 "1K" 1005[0402]RES 98.6,-23 r180 bottom
R16 "1K" 1005[0402]RES 35,13.3 r0 top
R17 "1K" 1005[0402]RES 103.6,23 r180 bottom
R18 "1K" 1005[0402]RES 103.6,-23 r180 bottom
R19 "1K" 1005[0402]RES 53.5,-27.5 r180 top
R20 "1K" 1005[0402]RES 108.6,23 r180 bottom
R21 "1K" 1005[0402]RES 108.6,-23 r180 bottom
R22 "1K" 1005[0402]RES 35,17.8 r0 top
R23 "0R 0603" 1608[0603]RES 48.3,-21.8 r0 top
R24 "1.5K" 1005[0402]RES 51.3,-23.4 r180 top
R25 "10K" 1005[0402]RES 53.5,-23.1 r180 top
R26 "1.2K" 1005[0402]RES 53.5,-22.1 r180 top
R27 "33R" 1005[0402]RES 27,-12.4 r0 top
R28 "33R" 1005[0402]RES 27,-13.4 r0 top
R29 "33R" 1005[0402]RES 27,-15.4 r0 top
R30 "33R" 1005[0402]RES 27,-16.4 r0 top
R31 "1K" 1005[0402]RES 66.6,-27.5 r180 top
R32 "0R 0603" 1608[0603]RES 61.4,-21.8 r0 top
R33 "3.4K" 1005[0402]RES 64.4,-23.4 r180 top
R34 "10K" 1005[0402]RES 66.6,-23.1 r180 top
R35 "1.6K" 1005[0402]RES 66.6,-22.1 r180 top
R36 "10K" 1005[0402]RES 50,1.5 r0 bottom
R37 "10K" 1005[0402]RES 49,3.5 r0 bottom
R38 "10K" 1005[0402]RES 47.5,10 r270 bottom
R39 "10K" 1005[0402]RES 48.5,5 r90 bottom
R40 "1K" 1005[0402]RES 27,-11.4 r180 top
R41 "1K" 1005[0402]RES 27,-14.4 r180 top
R42 "1K" 1005[0402]RES 56.6,27.3 r0 top
R43 "1K" 1005[0402]RES 27,-17.4 r180 top
R44 "0R 0603" 1608[0603]RES 61.8,21.6 r180 top
R45 "3.09K" 1005[0402]RES 58.8,23.2 r0 top
R46 "10K" 1005[0402]RES 56.6,22.9 r0 top
R47 "33.2R" 1005[0402]RES 33.4,-13.6 r0 bottom
R49 "10K" 1005[0402]RES 36.4,-12.6 r180 bottom
R50 "1K" 1005[0402]RES 56.6,21.9 r0 top
R55 "2K" 1005[0402]RES 44.5,10 r90 bottom
R56 "10R 0603" 1608[0603]RES 93.7,15.1 r180 top
R57 "10R 0603" 1608[0603]RES 106.6,15.7 r180 top
R58 "402R 0603" 1608[0603]RES 97.7,5.1 r180 top
R59 "10R 0603" 1608[0603]RES 117.6,9.3 r180 top
R60 "10R 0603" 1608[0603]RES 100.1,15.1 r180 top
R61 "33R" 1005[0402]RES 77,7.2 r180 bottom
R62 "10R 0603" 1608[0603]RES 100.1,5.1 r180 top
R63 "10R 0603" 1608[0603]RES 117.6,5.1 r0 top
R64 "33R" 1005[0402]RES 77,17.1 r180 top
R65 "33R" 1005[0402]RES 77,7.9 r180 top
R66 "10R 0603" 1608[0603]RES 106.6,8.7 r180 top
R67 "33R" 1005[0402]RES 77,8.5 r180 bottom
R68 "33R" 1005[0402]RES 77,9.2 r180 top
R69 "200R 0603" 1608[0603]RES 93.7,6.5 r0 top
R70 "33R" 1005[0402]RES 77,9.8 r180 bottom
R71 "33R" 1005[0402]RES 77,10.5 r180 top
R72 "100R 0603" 1608[0603]RES 96.1,19.3 r180 top
R73 "200R 0603" 1608[0603]RES 102.9,13.7 r180 top
R74 "200R 0603" 1608[0603]RES 93.7,7.9 r0 top
R75 "33R" 1005[0402]RES 77,11.1 r180 bottom
R76 "200R 0603" 1608[0603]RES 102.9,15.1 r0 top
R77 "1K 0603" 1608[0603]RES 117.6,19.3 r180 top
R78 "33R" 1005[0402]RES 77,11.8 r180 top
R79 "200R 0603" 1608[0603]RES 102.9,16.5 r180 top
R80 "402R 0603" 1608[0603]RES 96.8,11.2 r270 top
R81 "33R" 1005[0402]RES 77,12.4 r180 bottom
R82 "200R 0603" 1608[0603]RES 102.9,10.7 r0 top
R83 "100R 0603" 1608[0603]RES 102.9,17.9 r0 top
R84 "33R" 1005[0402]RES 77,13.1 r180 top
R85 "200R 0603" 1608[0603]RES 102.9,9.3 r180 top
R86 "100R 0603" 1608[0603]RES 102.9,19.3 r180 top
R87 "2K 0603" 1608[0603]RES 89.6,8.3 r0 top
R88 "26.1R 0603" 1608[0603]RES 93.7,9.3 r0 top
R89 "28.7R 0603" 1608[0603]RES 93.7,5.1 r0 top
R90 "10R 0603" 1608[0603]RES 93.7,16.5 r0 top
R91 "33R" 1005[0402]RES 77,13.7 r180 bottom
R92 "200R 0603" 1608[0603]RES 102.9,7.9 r0 top
R93 "10R 0603" 1608[0603]RES 98.2,11.2 r270 top
R94 "10R 0603" 1608[0603]RES 117.6,17.9 r0 top
R95 "33R" 1005[0402]RES 77,14.4 r180 top
R96 "100R 0603" 1608[0603]RES 102.9,6.5 r180 top
R97 "33R" 1005[0402]RES 77,15 r180 bottom
R98 "100R 0603" 1608[0603]RES 102.9,5.1 r0 top
R99 "33R" 1005[0402]RES 77,15.7 r180 top
R100 "33R" 1005[0402]RES 77,16.3 r180 bottom
R101 "1K 0603" 1608[0603]RES 109.7,-19.1 r180 top
R102 "10R 0603" 1608[0603]RES 118.9,-9 r270 top
R103 "1K 0603" 1608[0603]RES 109.7,-11.6 r180 top
R104 "10R 0603" 1608[0603]RES 97.5,-9 r180 top
R105 "18.7K 0603" 1608[0603]RES 90.7,-19.3 r180 top
R106 "10R 0603" 1608[0603]RES 121.7,-9 r270 top
R107 "10R 0603" 1608[0603]RES 109.7,-17.7 r0 top
R108 "10R 0603" 1608[0603]RES 88.3,-17.9 r0 top
R109 "10R 0603" 1608[0603]RES 109.7,-10.2 r0 top
R110 "10R 0603" 1608[0603]RES 97.5,-16 r180 top
R111 "1K 0603" 1608[0603]RES 115.9,-13.5 r0 top
R112 "1K 0603" 1608[0603]RES 112.1,-13.5 r180 top
R113 "1K 0603" 1608[0603]RES 88.3,-19.3 r180 top
R114 "100R 0603" 1608[0603]RES 121.7,-11.4 r90 top
R115 "200R 0603" 1608[0603]RES 106.8,-13.5 r0 top
R116 "1K 0603" 1608[0603]RES 115.9,-6 r0 top
R117 "1K 0603" 1608[0603]RES 112.1,-6 r180 top
R118 "200R 0603" 1608[0603]RES 106.8,-14.9 r180 top
R119 "200R 0603" 1608[0603]RES 106.8,-16.3 r0 top
R120 "200R 0603" 1608[0603]RES 106.8,-11.6 r180 top
R121 "1K 0603" 1608[0603]RES 115.9,-19.1 r0 top
R122 "100R 0603" 1608[0603]RES 106.8,-17.7 r180 top
R123 "200R 0603" 1608[0603]RES 106.8,-10.2 r0 top
R124 "1K 0603" 1608[0603]RES 115.9,-11.6 r0 top
R125 "100R 0603" 1608[0603]RES 106.8,-19.1 r0 top
R126 "200R 0603" 1608[0603]RES 106.8,-8.8 r180 top
R127 "10R 0603" 1608[0603]RES 121.7,-16.2 r90 top
R128 "100R 0603" 1608[0603]RES 106.8,-7.4 r0 top
R129 "10R 0603" 1608[0603]RES 115.9,-14.9 r180 top
R130 "10R 0603" 1608[0603]RES 94.5,-15.1 r180 top
R131 "100R 0603" 1608[0603]RES 106.8,-6 r180 top
R132 "10R 0603" 1608[0603]RES 115.9,-7.4 r180 top
R133 "1K 0603" 1608[0603]RES 86.5,-4.8 r180 top
R134 "10R 0603" 1608[0603]RES 86.5,-13.2 r0 top
R135 "499R 0603" 1608[0603]RES 95,-6.5 r270 top
R136 "499R 0603" 1608[0603]RES 93.6,-6.5 r270 top
R137 "499R 0603" 1608[0603]RES 92.2,-6.5 r270 top
R138 "5R 0603" 1608[0603]RES 86.5,-6.2 r180 top
R139 "22R 0603" 1608[0603]RES 86.5,-7.6 r180 top
R140 "1.78K" 1005[0402]RES 81.9,-2.2 r180 top
R141 "2.8K" 1005[0402]RES 92.2,-2.2 r180 top
R142 "1K" 1005[0402]RES 84.1,-2.2 r180 top
R143 "1K" 1005[0402]RES 94.4,-2.2 r180 top
R144 "5R 0603" 1608[0603]RES 86.5,-10.4 r180 top
R145 "22R 0603" 1608[0603]RES 86.5,-9 r180 top
R146 "499R 0603" 1608[0603]RES 95,-11.3 r90 top
R147 "499R 0603" 1608[0603]RES 93.6,-11.3 r90 top
R148 "499R 0603" 1608[0603]RES 92.2,-11.3 r90 top
R149 "1K 0603" 1608[0603]RES 86.5,-11.8 r180 top
R150 "33R" 1005[0402]RES 75.8,-10.4 r0 top
R151 "33R" 1005[0402]RES 75.8,-9.4 r0 top
R152 "33R" 1005[0402]RES 75.8,-8.4 r0 top
R153 "33R" 1005[0402]RES 75.8,-7.4 r0 top
R154 "1.27K" 1005[0402]RES 102.7,-2.2 r180 top
R155 "1.3K" 1005[0402]RES 113.4,-2.2 r180 top
R156 "33R" 1005[0402]RES 75.8,-6.4 r0 top
R157 "33R" 1005[0402]RES 75.8,-5.4 r0 top
R158 "1K" 1005[0402]RES 104.9,-2.2 r180 top
R159 "1K" 1005[0402]RES 115.6,-2.2 r180 top
R160 "33R" 1005[0402]RES 75.8,-4.4 r0 top
R161 "33R" 1005[0402]RES 78.3,-4.4 r0 top
R162 "0.047R 0603" 1608[0603]RES 85.3,-19.3 r180 top
R163 "120K 0603" 1608[0603]RES 76,-17.9 r0 top
R164 "0R 0603" 1608[0603]RES 75.9,0 r180 top
S1 "K3-1391B-51" SWITCH_K3-1391B-51 30.8,15.35 r90 top
TP1 "TP_P" tpad_020_REC 28.6,3.2 r90 top
TP2 "TP_P" tpad_020_REC 28.6,1.9 r90 top
TP3 "TP_N" tpad_020 30.4,6.1 r90 top
TP4 "TP_P" tpad_020_REC 37.4,0.7 r90 top
TP5 "TP_P" tpad_020_REC 37.4,-1.9 r90 top
TP6 "TP_P" tpad_020_REC 70.1,22 r0 top
TP7 "TP_N" tpad_020 68.8,22 r0 top
TP8 "TP_P" tpad_020_REC 45.3,21.6 r270 top
TP9 "TP_N" tpad_020 48.4,21.6 r270 top
TP10 "TP_P" tpad_020_REC 36.8,17.8 r90 top
TP11 "TP_P" tpad_020_REC 46.3,-21.8 r90 top
TP12 "TP_N" tpad_020 43.2,-21.8 r90 top
TP13 "TP_P" tpad_020_REC 59.4,-21.8 r90 top
TP14 "TP_N" tpad_020 56.3,-21.8 r90 top
TP15 "TP_P" tpad_020_REC 63.8,21.6 r270 top
TP16 "TP_N" tpad_020 66.9,21.6 r270 top
TP17 "TP_P" tpad_020_REC 110.3,7.2 r90 top
TP18 "TP_P" tpad_020_REC 109.2,7.2 r90 top
TP19 "TP_P" tpad_020_REC 109.2,17.2 r90 top
TP20 "TP_P" tpad_020_REC 110.3,17.2 r90 top
TP21 "TP_P" tpad_020_REC 111.4,7.2 r90 top
TP22 "TP_P" tpad_020_REC 71.7,17.1 r90 top
TP23 "TP_P" tpad_020_REC 112.5,7.2 r90 top
TP24 "TP_P" tpad_020_REC 113.6,7.2 r90 top
TP25 "TP_P" tpad_020_REC 114.7,7.2 r90 top
TP26 "TP_P" tpad_020_REC 96.7,-17.5 r90 top
TP27 "TP_P" tpad_020_REC 98.6,13.5 r90 top
TP28 "TP_P" tpad_020_REC 111.4,17.2 r90 top
TP29 "TP_P" tpad_020_REC 112.5,17.2 r90 top
TP30 "TP_P" tpad_020_REC 113.6,17.2 r90 top
TP31 "TP_P" tpad_020_REC 114.7,17.2 r90 top
TP32 "TP_P" tpad_020_REC 91.8,11 r90 top
TP33 "TP_P" tpad_020_REC 91.8,13.2 r90 top
TP34 "TP_N" tpad_020 100.9,13.5 r90 top
TP35 "TP_N" tpad_020 107.6,7.2 r90 top
TP36 "TP_N" tpad_020 94.1,12.1 r90 top
TP37 "TP_P" tpad_020_REC 100.2,-17.5 r90 top
TP38 "TP_P" tpad_020_REC 99.1,-17.5 r90 top
TP39 "TP_P" tpad_020_REC 99.1,-7.5 r90 top
TP40 "TP_P" tpad_020_REC 100.2,-7.5 r90 top
TP41 "TP_P" tpad_020_REC 101.3,-17.5 r90 top
TP42 "TP_P" tpad_020_REC 102.4,-17.5 r90 top
TP43 "TP_P" tpad_020_REC 103.5,-17.5 r90 top
TP44 "TP_P" tpad_020_REC 104.6,-17.5 r90 top
TP45 "TP_P" tpad_020_REC 123.2,-11.6 r90 top
TP46 "TP_P" tpad_020_REC 101.3,-7.5 r90 top
TP47 "TP_P" tpad_020_REC 102.4,-7.5 r90 top
TP48 "TP_P" tpad_020_REC 92.7,-19.3 r90 top
TP49 "TP_P" tpad_020_REC 103.5,-7.5 r90 top
TP50 "TP_P" tpad_020_REC 104.6,-7.5 r90 top
TP51 "TP_N" tpad_020 95.2,-19.3 r90 top
TP52 "TP_N" tpad_020 123.2,-15.6 r90 top
TP53 "TP_N" tpad_020 97.5,-7.4 r270 top
TP54 "TP_P" tpad_020_REC 79.6,2.3 r90 top
TP55 "TP_P" tpad_020_REC 89.9,2.3 r90 top
TP56 "TP_P" tpad_020_REC 83.2,-7.2 r90 top
TP57 "TP_P" tpad_020_REC 83.2,-10.5 r90 top
TP58 "TP_N" tpad_020 79.6,-2.2 r90 top
TP59 "TP_N" tpad_020 89.9,-2.2 r90 top
TP60 "TP_N" tpad_020 83.2,-8.8 r90 top
TP61 "TP_P" tpad_020_REC 100.4,2.3 r90 top
TP62 "TP_P" tpad_020_REC 111.1,2.3 r90 top
TP63 "TP_P" tpad_020_REC 74,-10.4 r90 top
TP64 "TP_P" tpad_020_REC 74,-9.4 r90 top
TP65 "TP_P" tpad_020_REC 74,-8.4 r90 top
TP66 "TP_P" tpad_020_REC 86.1,-16.5 r90 top
TP67 "TP_N" tpad_020 100.4,-2.2 r90 top
TP68 "TP_N" tpad_020 111.1,-2.2 r90 top
TP69 "TP_N" tpad_020 74,-13.6 r90 top
TP70 "TP_N" tpad_020 84.6,-16.5 r90 top
TP71 "TP_P" tpad_020_REC 35.6,27.7 r180 top
TP72 "TP_N" tpad_020 35.6,24.9 r180 top
TP73 "TP_N" tpad_020 96.7,-19.3 r90 top
U1 "CH343G" SO-16 33,0 r270 top
U2 "5CEFA7F23I7N" FBGA484 55,0 r0 top locked
U3 "LM2776DBV" SOT23-6 70.1,24.3 r180 top
U4 "TLV62130RGT" S-PVQFN-N16 41.5,26 r180 top
U5 "TLV62130RGT" S-PVQFN-N16 50.1,-26.2 r0 top
U6 "TLV62130RGT" S-PVQFN-N16 63.2,-26.2 r0 top
U7 "TLV62130RGT" S-PVQFN-N16 60,26 r180 top
U8 "MT25QL128ABA8E12-0SIT" T-PBGA_5X5 32.9,-12.6 r0 top
U9 "DAC904E" TSSOP28 82.7,12.1 r0 top
U10 "TMUX1108PWR" TSSOP16 112.1,12.2 r90 top
U11 "OPA810IDBVR" SOT23-5 96.9,16.5 r270 top
U12 "OPA810IDBVR" SOT23-5 96.9,7.9 r270 top
U13 "OPA810IDBVR" SOT23-5 117.6,12.2 r270 top
U14 "TMUX1108PWR" TSSOP16 102,-12.5 r90 top
U15 "OPA320AIDBVR" SOT23-5 119.1,-12.6 r90 top
U16 "OPA320AIDBVR" SOT23-5 112.8,-16.3 r90 top
U17 "OPA320AIDBVR" SOT23-5 91.4,-16.5 r90 top
U18 "OPA320AIDBVR" SOT23-5 112.8,-8.8 r90 top
U19 "TPS7A4901DGN" HVSSOP8 84.4,0 r0 top
U20 "TPS7A4901DGN" HVSSOP8 94.7,0 r0 top
U21 "ADS127L21IRUK" WQFN20 79.9,-8.8 r180 top
U22 "THS4551IDGK" VSSOP8 89.6,-8.9 r270 top
U23 "TPS7A4901DGN" HVSSOP8 105.2,0 r0 top
U24 "TPS7A3001DGN" HVSSOP8 115.9,0 r0 top
U25 "REF6025IDGK" VSSOP8 80.6,-17.9 r0 top
Y1 "ASEMB-100.000MHz-LY-T" XTAL_3.2X2.5 57.96,-13.77 r0 top

## Footprints (in the part's own frame and the unit in brackets; to place one, negate y for a bottom-side part, rotate by r counter-clockwise, add the part's x,y. Pads: shape width x height; smd on the part's side, far side on the other; paste and mask are expansions set on the pad)
1005[0402]CAP [mm]
  rect 0.5x0.635 smd: 1(-0.5,0) 2(0.5,0)
  silkscreen extent -1,-0.5 1,0.5, body extent -0.5,-0.25 0.5,0.25, height 0.3
1005[0402]RES [mm]
  rect 0.5x0.635 smd: 1(-0.5,0) 2(0.5,0)
  silkscreen extent -1,-0.5 1,0.5, body extent -0.5,-0.25 0.5,0.25, height 0.3
1206 [mm]
  rect 1.6x1.8 smd: 1(-1.4,0) 2(1.4,0)
  silkscreen extent -2.5,-1.2 2.5,1.2, body extent -1.52,-0.76 1.52,0.76, height 0.51
1206CAP [mm]
  rrect50% 1.6x1.8 smd: 1(-1.4,0) 2(1.4,0)
  silkscreen extent -2.5,-1.2 2.5,1.2, body extent -1.85,-0.98 1.85,0.97, height 1.21
1608[0603]CAP [mm]
  rrect50% 0.6x1 smd: 1(-0.7,0) 2(0.7,0)
  silkscreen extent -1.2,-0.7 1.2,0.7, body extent -0.8,-0.4 0.8,0.4, height 0.3
1608[0603]FB [mm]
  rrect50% 0.6x1 smd: 1(-0.7,0) 2(0.7,0)
  silkscreen extent -1.2,-0.7 1.2,0.7, body extent -0.8,-0.4 0.8,0.4, height 0.5
1608[0603]LED [mm]
  rect 0.8x0.8 smd: 1(-0.8,0) 2(0.8,0)
  silkscreen extent -1.4,-0.6 1.4,0.6, body extent -0.81,-0.4 0.81,0.4, height 1.1
1608[0603]RES [mm]
  rrect50% 0.6x1 smd: 1(-0.7,0) 2(0.7,0)
  silkscreen extent -1.2,-0.7 1.2,0.7, body extent -0.8,-0.4 0.8,0.4, height 0.45
BM04B-SRSS-TB [mm]
  oval 0.6x1.55 smd: 1(-1.5,-1.262) 2(-0.5,-1.262) 3(0.5,-1.262) 4(1.5,-1.262)
  oval 1.2x1.8 smd: 5(2.8,1.262) 6(-2.8,1.262)
  silkscreen extent -3,-0.9 3,2, body extent -3,-1.6 3,2, height 4.29
BNC_5227661-1 [mm]
  round 1.2 hole 0.89 mask+0.05: 1(0,-12.83) 2(-2.54,-12.83)
  round 2.5 hole 2.01 mask+0.05: 3(5.08,-7.75) 4(-5.08,-7.75)
  silkscreen extent -7.42,-14.75 7.38,0, body extent -7.4,-14.75 7.36,20.81, height 15.88
FBGA484 [mm]
  round 0.45 smd: A1(-10.5,10.5) A2(-9.5,10.5) A3(-8.5,10.5) A4(-7.5,10.5) A5(-6.5,10.5) A6(-5.5,10.5) A7(-4.5,10.5) A8(-3.5,10.5) A9(-2.5,10.5) A10(-1.5,10.5) A11(-0.5,10.5) A12(0.5,10.5) A13(1.5,10.5) A14(2.5,10.5) A15(3.5,10.5) A16(4.5,10.5) A17(5.5,10.5) A18(6.5,10.5) A19(7.5,10.5) A20(8.5,10.5) A21(9.5,10.5) A22(10.5,10.5) AA1(-10.5,-9.5) AA2(-9.5,-9.5) AA3(-8.5,-9.5) AA4(-7.5,-9.5) AA5(-6.5,-9.5) AA6(-5.5,-9.5) AA7(-4.5,-9.5) AA8(-3.5,-9.5) AA9(-2.5,-9.5) AA10(-1.5,-9.5) AA11(-0.5,-9.5) AA12(0.5,-9.5) AA13(1.5,-9.5) AA14(2.5,-9.5) AA15(3.5,-9.5) AA16(4.5,-9.5) AA17(5.5,-9.5) AA18(6.5,-9.5) AA19(7.5,-9.5) AA20(8.5,-9.5) AA21(9.5,-9.5) AA22(10.5,-9.5) AB1(-10.5,-10.5) AB2(-9.5,-10.5) AB3(-8.5,-10.5) AB4(-7.5,-10.5) AB5(-6.5,-10.5) AB6(-5.5,-10.5) AB7(-4.5,-10.5) AB8(-3.5,-10.5) AB9(-2.5,-10.5) AB10(-1.5,-10.5) AB11(-0.5,-10.5) AB12(0.5,-10.5) AB13(1.5,-10.5) AB14(2.5,-10.5) AB15(3.5,-10.5) AB16(4.5,-10.5) AB17(5.5,-10.5) AB18(6.5,-10.5) AB19(7.5,-10.5) AB20(8.5,-10.5) AB21(9.5,-10.5) AB22(10.5,-10.5) B1(-10.5,9.5) B2(-9.5,9.5) B3(-8.5,9.5) B4(-7.5,9.5) B5(-6.5,9.5) B6(-5.5,9.5) B7(-4.5,9.5) B8(-3.5,9.5) B9(-2.5,9.5) B10(-1.5,9.5) B11(-0.5,9.5) B12(0.5,9.5) B13(1.5,9.5) B14(2.5,9.5) B15(3.5,9.5) B16(4.5,9.5) B17(5.5,9.5) B18(6.5,9.5) B19(7.5,9.5) B20(8.5,9.5) B21(9.5,9.5) B22(10.5,9.5) C1(-10.5,8.5) C2(-9.5,8.5) C3(-8.5,8.5) C4(-7.5,8.5) C5(-6.5,8.5) C6(-5.5,8.5) C7(-4.5,8.5) C8(-3.5,8.5) C9(-2.5,8.5) C10(-1.5,8.5) C11(-0.5,8.5) C12(0.5,8.5) C13(1.5,8.5) C14(2.5,8.5) C15(3.5,8.5) C16(4.5,8.5) C17(5.5,8.5) C18(6.5,8.5) C19(7.5,8.5) C20(8.5,8.5) C21(9.5,8.5) C22(10.5,8.5) D1(-10.5,7.5) D2(-9.5,7.5) D3(-8.5,7.5) D4(-7.5,7.5) D5(-6.5,7.5) D6(-5.5,7.5) D7(-4.5,7.5) D8(-3.5,7.5) D9(-2.5,7.5) D10(-1.5,7.5) D11(-0.5,7.5) D12(0.5,7.5) D13(1.5,7.5) D14(2.5,7.5) D15(3.5,7.5) D16(4.5,7.5) D17(5.5,7.5) D18(6.5,7.5) D19(7.5,7.5) D20(8.5,7.5) D21(9.5,7.5) D22(10.5,7.5) E1(-10.5,6.5) E2(-9.5,6.5) E3(-8.5,6.5) E4(-7.5,6.5) E5(-6.5,6.5) E6(-5.5,6.5) E7(-4.5,6.5) E8(-3.5,6.5) E9(-2.5,6.5) E10(-1.5,6.5) E11(-0.5,6.5) E12(0.5,6.5) E13(1.5,6.5) E14(2.5,6.5) E15(3.5,6.5) E16(4.5,6.5) E17(5.5,6.5) E18(6.5,6.5) E19(7.5,6.5) E20(8.5,6.5) E21(9.5,6.5) E22(10.5,6.5) F1(-10.5,5.5) F2(-9.5,5.5) F3(-8.5,5.5) F4(-7.5,5.5) F5(-6.5,5.5) F6(-5.5,5.5) F7(-4.5,5.5) F8(-3.5,5.5) F9(-2.5,5.5) F10(-1.5,5.5) F11(-0.5,5.5) F12(0.5,5.5) F13(1.5,5.5) F14(2.5,5.5) F15(3.5,5.5) F16(4.5,5.5) F17(5.5,5.5) F18(6.5,5.5) F19(7.5,5.5) F20(8.5,5.5) F21(9.5,5.5) F22(10.5,5.5) G1(-10.5,4.5) G2(-9.5,4.5) G3(-8.5,4.5) G4(-7.5,4.5) G5(-6.5,4.5) G6(-5.5,4.5) G7(-4.5,4.5) G8(-3.5,4.5) G9(-2.5,4.5) G10(-1.5,4.5) G11(-0.5,4.5) G12(0.5,4.5) G13(1.5,4.5) G14(2.5,4.5) G15(3.5,4.5) G16(4.5,4.5) G17(5.5,4.5) G18(6.5,4.5) G19(7.5,4.5) G20(8.5,4.5) G21(9.5,4.5) G22(10.5,4.5) H1(-10.5,3.5) H2(-9.5,3.5) H3(-8.5,3.5) H4(-7.5,3.5) H5(-6.5,3.5) H6(-5.5,3.5) H7(-4.5,3.5) H8(-3.5,3.5) H9(-2.5,3.5) H10(-1.5,3.5) H11(-0.5,3.5) H12(0.5,3.5) H13(1.5,3.5) H14(2.5,3.5) H15(3.5,3.5) H16(4.5,3.5) H17(5.5,3.5) H18(6.5,3.5) H19(7.5,3.5) H20(8.5,3.5) H21(9.5,3.5) H22(10.5,3.5) J1(-10.5,2.5) J2(-9.5,2.5) J3(-8.5,2.5) J4(-7.5,2.5) J5(-6.5,2.5) J6(-5.5,2.5) J7(-4.5,2.5) J8(-3.5,2.5) J9(-2.5,2.5) J10(-1.5,2.5) J11(-0.5,2.5) J12(0.5,2.5) J13(1.5,2.5) J14(2.5,2.5) J15(3.5,2.5) J16(4.5,2.5) J17(5.5,2.5) J18(6.5,2.5) J19(7.5,2.5) J20(8.5,2.5) J21(9.5,2.5) J22(10.5,2.5) K1(-10.5,1.5) K2(-9.5,1.5) K3(-8.5,1.5) K4(-7.5,1.5) K5(-6.5,1.5) K6(-5.5,1.5) K7(-4.5,1.5) K8(-3.5,1.5) K9(-2.5,1.5) K10(-1.5,1.5) K11(-0.5,1.5) K12(0.5,1.5) K13(1.5,1.5) K14(2.5,1.5) K15(3.5,1.5) K16(4.5,1.5) K17(5.5,1.5) K18(6.5,1.5) K19(7.5,1.5) K20(8.5,1.5) K21(9.5,1.5) K22(10.5,1.5) L1(-10.5,0.5) L2(-9.5,0.5) L3(-8.5,0.5) L4(-7.5,0.5) L5(-6.5,0.5) L6(-5.5,0.5) L7(-4.5,0.5) L8(-3.5,0.5) L9(-2.5,0.5) L10(-1.5,0.5) L11(-0.5,0.5) L12(0.5,0.5) L13(1.5,0.5) L14(2.5,0.5) L15(3.5,0.5) L16(4.5,0.5) L17(5.5,0.5) L18(6.5,0.5) L19(7.5,0.5) L20(8.5,0.5) L21(9.5,0.5) L22(10.5,0.5) M1(-10.5,-0.5) M2(-9.5,-0.5) M3(-8.5,-0.5) M4(-7.5,-0.5) M5(-6.5,-0.5) M6(-5.5,-0.5) M7(-4.5,-0.5) M8(-3.5,-0.5) M9(-2.5,-0.5) M10(-1.5,-0.5) M11(-0.5,-0.5) M12(0.5,-0.5) M13(1.5,-0.5) M14(2.5,-0.5) M15(3.5,-0.5) M16(4.5,-0.5) M17(5.5,-0.5) M18(6.5,-0.5) M19(7.5,-0.5) M20(8.5,-0.5) M21(9.5,-0.5) M22(10.5,-0.5) N1(-10.5,-1.5) N2(-9.5,-1.5) N3(-8.5,-1.5) N4(-7.5,-1.5) N5(-6.5,-1.5) N6(-5.5,-1.5) N7(-4.5,-1.5) N8(-3.5,-1.5) N9(-2.5,-1.5) N10(-1.5,-1.5) N11(-0.5,-1.5) N12(0.5,-1.5) N13(1.5,-1.5) N14(2.5,-1.5) N15(3.5,-1.5) N16(4.5,-1.5) N17(5.5,-1.5) N18(6.5,-1.5) N19(7.5,-1.5) N20(8.5,-1.5) N21(9.5,-1.5) N22(10.5,-1.5) P1(-10.5,-2.5) P2(-9.5,-2.5) P3(-8.5,-2.5) P4(-7.5,-2.5) P5(-6.5,-2.5) P6(-5.5,-2.5) P7(-4.5,-2.5) P8(-3.5,-2.5) P9(-2.5,-2.5) P10(-1.5,-2.5) P11(-0.5,-2.5) P12(0.5,-2.5) P13(1.5,-2.5) P14(2.5,-2.5) P15(3.5,-2.5) P16(4.5,-2.5) P17(5.5,-2.5) P18(6.5,-2.5) P19(7.5,-2.5) P20(8.5,-2.5) P21(9.5,-2.5) P22(10.5,-2.5) R1(-10.5,-3.5) R2(-9.5,-3.5) R3(-8.5,-3.5) R4(-7.5,-3.5) R5(-6.5,-3.5) R6(-5.5,-3.5) R7(-4.5,-3.5) R8(-3.5,-3.5) R9(-2.5,-3.5) R10(-1.5,-3.5) R11(-0.5,-3.5) R12(0.5,-3.5) R13(1.5,-3.5) R14(2.5,-3.5) R15(3.5,-3.5) R16(4.5,-3.5) R17(5.5,-3.5) R18(6.5,-3.5) R19(7.5,-3.5) R20(8.5,-3.5) R21(9.5,-3.5) R22(10.5,-3.5) T1(-10.5,-4.5) T2(-9.5,-4.5) T3(-8.5,-4.5) T4(-7.5,-4.5) T5(-6.5,-4.5) T6(-5.5,-4.5) T7(-4.5,-4.5) T8(-3.5,-4.5) T9(-2.5,-4.5) T10(-1.5,-4.5) T11(-0.5,-4.5) T12(0.5,-4.5) T13(1.5,-4.5) T14(2.5,-4.5) T15(3.5,-4.5) T16(4.5,-4.5) T17(5.5,-4.5) T18(6.5,-4.5) T19(7.5,-4.5) T20(8.5,-4.5) T21(9.5,-4.5) T22(10.5,-4.5) U1(-10.5,-5.5) U2(-9.5,-5.5) U3(-8.5,-5.5) U4(-7.5,-5.5) U5(-6.5,-5.5) U6(-5.5,-5.5) U7(-4.5,-5.5) U8(-3.5,-5.5) U9(-2.5,-5.5) U10(-1.5,-5.5) U11(-0.5,-5.5) U12(0.5,-5.5) U13(1.5,-5.5) U14(2.5,-5.5) U15(3.5,-5.5) U16(4.5,-5.5) U17(5.5,-5.5) U18(6.5,-5.5) U19(7.5,-5.5) U20(8.5,-5.5) U21(9.5,-5.5) U22(10.5,-5.5) V1(-10.5,-6.5) V2(-9.5,-6.5) V3(-8.5,-6.5) V4(-7.5,-6.5) V5(-6.5,-6.5) V6(-5.5,-6.5) V7(-4.5,-6.5) V8(-3.5,-6.5) V9(-2.5,-6.5) V10(-1.5,-6.5) V11(-0.5,-6.5) V12(0.5,-6.5) V13(1.5,-6.5) V14(2.5,-6.5) V15(3.5,-6.5) V16(4.5,-6.5) V17(5.5,-6.5) V18(6.5,-6.5) V19(7.5,-6.5) V20(8.5,-6.5) V21(9.5,-6.5) V22(10.5,-6.5) W1(-10.5,-7.5) W2(-9.5,-7.5) W3(-8.5,-7.5) W4(-7.5,-7.5) W5(-6.5,-7.5) W6(-5.5,-7.5) W7(-4.5,-7.5) W8(-3.5,-7.5) W9(-2.5,-7.5) W10(-1.5,-7.5) W11(-0.5,-7.5) W12(0.5,-7.5) W13(1.5,-7.5) W14(2.5,-7.5) W15(3.5,-7.5) W16(4.5,-7.5) W17(5.5,-7.5) W18(6.5,-7.5) W19(7.5,-7.5) W20(8.5,-7.5) W21(9.5,-7.5) W22(10.5,-7.5) Y1(-10.5,-8.5) Y2(-9.5,-8.5) Y3(-8.5,-8.5) Y4(-7.5,-8.5) Y5(-6.5,-8.5) Y6(-5.5,-8.5) Y7(-4.5,-8.5) Y8(-3.5,-8.5) Y9(-2.5,-8.5) Y10(-1.5,-8.5) Y11(-0.5,-8.5) Y12(0.5,-8.5) Y13(1.5,-8.5) Y14(2.5,-8.5) Y15(3.5,-8.5) Y16(4.5,-8.5) Y17(5.5,-8.5) Y18(6.5,-8.5) Y19(7.5,-8.5) Y20(8.5,-8.5) Y21(9.5,-8.5) Y22(10.5,-8.5)
  silkscreen extent -11.5,-11.5 11.5,11.5, body extent -11.5,-11.5 11.5,11.5, height 2.5
HVSSOP8 [mm]
  rect 1.4x0.45 smd mask+0.04: 1(-2.2,0.975) 2(-2.2,0.325) 3(-2.2,-0.325) 4(-2.2,-0.975) 5(2.2,-0.975) 6(2.2,-0.325) 7(2.2,0.325) 8(2.2,0.975)
  rect 1.57x1.89 smd: 9(0,0)
  01_Top region: -1,-1.5 1,-1.5 1,1.5 -1,1.5
  silkscreen extent -2.9,-1.5 1.5,1.6, body extent -2.45,-1.5 2.45,1.5, height 1.05
KEF2510_2P [mm]
  rect 1.5x1.5 hole 1: 1(-1.27,0)
  round 1.5 hole 1: 2(1.27,0)
  silkscreen extent -2.6,-2.9 2.6,2.9, body extent -2.54,-2.9 2.54,2.9, height 11.45
S-PVQFN-N16 [mm]
  oval 0.85x0.28 smd mask+0.07: 1(-1.475,0.75) 2(-1.475,0.25) 3(-1.475,-0.25) 4(-1.475,-0.75) 9(1.475,-0.75) 10(1.475,-0.25) 11(1.475,0.25) 12(1.475,0.75)
  oval 0.28x0.85 smd mask+0.07: 5(-0.75,-1.475) 6(-0.25,-1.475) 7(0.25,-1.475) 8(0.75,-1.475) 13(0.75,1.475) 14(0.25,1.475) 15(-0.25,1.475) 16(-0.75,1.475)
  rect 1.7x1.7 smd paste-100 mask+0.07: 17(0,0)
  silkscreen extent -1.5,-1.5 1.5,1.5, body extent -1.8,-1.8 1.8,1.8, height 1
SC-90A [mm]
  rect 0.9x0.9 smd: 1(0,0)
  rect 1.1x0.9 smd: 2(0,2.4)
  silkscreen extent -0.8,0.3 0.8,2.1, body extent -0.68,-0.05 0.67,2.45, height 1
SM06B-SRSS-TB [mm]
  rect 0.6x1.55 smd: 1(0,0) 2(1,0) 3(2,0) 4(3,0) 5(4,0) 6(5,0)
  rect 1.2x1.8 smd: 7(-1.3,-3.875) 8(6.3,-3.875)
  silkscreen extent -0.3,-4.6 5.3,-4.6, body extent -1.5,-4.6 6.5,0.35, height 2.96
SO-16 [mm] "Small Outline; 16 Leads; Body Width 3.9 mm; Pitch 1.27 mm"
  rect 0.55x2.2 smd: 1(-4.445,-2.6) 2(-3.175,-2.6) 3(-1.905,-2.6) 4(-0.635,-2.6) 5(0.635,-2.6) 6(1.905,-2.6) 7(3.175,-2.6) 8(4.445,-2.6) 9(4.445,2.6) 10(3.175,2.6) 11(1.905,2.6) 12(0.635,2.6) 13(-0.635,2.6) 14(-1.905,2.6) 15(-3.175,2.6) 16(-4.445,2.6)
  silkscreen extent -5.39,-2.72 5,1.1, body extent -5.02,-2.95 4.97,2.96, height 1.45
SOT23-5 [mm] "SOT23, 5-Leads, Body 2.9x1.6mm, Pitch 0.95mm, Lead Span 2.8mm, IPC Medium Density"
  rect 1.1x0.65 smd: 1(-1.2,0.95) 2(-1.2,0) 3(-1.2,-0.95) 4(1.2,-0.95) 5(1.2,0.95)
  silkscreen extent -0.4,-1.5 0.4,1.5, body extent -1.4,-1.45 1.4,1.45, height 1.45
SOT23-6 [mm] "SOT23, 5-Leads, Body 2.9x1.6mm, Pitch 0.95mm, Lead Span 2.8mm, IPC Medium Density"
  rect 1.1x0.65 smd: 1(-1.2,0.95) 2(-1.2,0) 3(-1.2,-0.95) 4(1.2,-0.95) 5(1.2,0) 6(1.2,0.95)
  silkscreen extent -1.33,-1.55 0.25,1.95, body extent -1.2,-1.4 1.23,1.4, height 1.09
SWITCH_K3-1391B-51 [mm]
  rect 2.5x2.5 hole 1.6 mask+0.05: 1(-4.8,0)
  round 2.5 hole 1.6 mask+0.05: 2(0,0) 3(4.8,0) 4(-6.65,9.2) 5(6.65,9.2)
  silkscreen extent -6.8,1.5 6.8,15.8, body extent -6.75,-0.68 6.75,15.75, height 6.6
T-PBGA_5X5 [mm] "BGA49_0P5_3P62X4"
  round 0.4 smd: A2(1,0) A3(2,0) A4(3,0) A5(4,0) B1(0,-1) B2(1,-1) B3(2,-1) B4(3,-1) B5(4,-1) C1(0,-2) C2(1,-2) C3(2,-2) C4(3,-2) C5(4,-2) D1(0,-3) D2(1,-3) D3(2,-3) D4(3,-3) D5(4,-3) E1(0,-4) E2(1,-4) E3(2,-4) E4(3,-4) E5(4,-4)
  silkscreen extent -1,-6 5,2, body extent -0.95,-6 5,1.95, height 1.1
TE [mm]
  rect 2.25x2.45 smd: 1(-3.3,0) 2(3.3,0)
  silkscreen extent -4.8,-2.5 4.8,2.5, body extent -3.7,-2.22 3.7,2.22, height 4.19
tpad_020 [mil]
  round 20 smd paste-20: 1(0,0)
  silkscreen extent -17,-17 17,17
tpad_020_REC [mil]
  rect 20x20 smd paste-20: 1(0,0)
  silkscreen extent -17,-17 17,17
TSSOP16 [mm]
  rect 1.65x0.3 smd: 1(-2.775,2.275) 2(-2.775,1.625) 3(-2.775,0.975) 4(-2.775,0.325) 5(-2.775,-0.325) 6(-2.775,-0.975) 7(-2.775,-1.625) 8(-2.775,-2.275) 9(2.775,-2.275) 10(2.775,-1.625) 11(2.775,-0.975) 12(2.775,-0.325) 13(2.775,0.325) 14(2.775,0.975) 15(2.775,1.625) 16(2.775,2.275)
  silkscreen extent -2.9,-2.55 1.55,3.1, body extent -3.18,-2.5 3.1,2.5, height 1.09
TSSOP28 [mm]
  rect 1.65x0.3 smd: 1(-3.05,4.225) 2(-3.05,3.575) 3(-3.05,2.925) 4(-3.05,2.275) 5(-3.05,1.625) 6(-3.05,0.975) 7(-3.05,0.325) 8(-3.05,-0.325) 9(-3.05,-0.975) 10(-3.05,-1.625) 11(-3.05,-2.275) 12(-3.05,-2.925) 13(-3.05,-3.575) 14(-3.05,-4.225) 15(3.05,-4.225) 16(3.05,-3.575) 17(3.05,-2.925) 18(3.05,-2.275) 19(3.05,-1.625) 20(3.05,-0.975) 21(3.05,-0.325) 22(3.05,0.325) 23(3.05,0.975) 24(3.05,1.625) 25(3.05,2.275) 26(3.05,2.925) 27(3.05,3.575) 28(3.05,4.225)
  silkscreen extent -3.7,-4.9 3.2,4.9, body extent -3.2,-4.85 3.2,4.85, height 0.97
USBTypeC [mm]
  oval 1x2.1 hole 0.6 slot 1.7 at 90 deg mask+0.102: 1(-4.32,0.5) 2(4.32,0.5)
  oval 1x1.8 hole 0.6 slot 1.4 at 90 deg mask+0.102: 3(4.32,-3.65) 4(-4.32,-3.65)
  rect 0.3x1.15 smd mask+0.05: A1(-3.35,1.075) A4(-2.55,1.075) A5(-1.25,1.075) A6(-0.25,1.075) A7(0.25,1.075) A8(1.25,1.075) A9(2.55,1.075) A12(3.35,1.075) B1(3.05,1.075) B4(2.25,1.075) B5(1.75,1.075) B6(0.75,1.075) B7(-0.75,1.075) B8(-1.75,1.075) B9(-2.25,1.075) B12(-3.05,1.075)
  round 0.6 hole 0.65 unplated mask+0.102: H1(-2.89,0) H2(2.89,0)
  silkscreen extent -4.8,-6.3 4.8,-0.6, body extent -4.79,-6.3 4.79,1.41, height 3.26
VSSOP8 [mm]
  rect 1.45x0.45 smd mask+0.05: 1(-2.2,0.975) 2(-2.2,0.325) 3(-2.2,-0.325) 4(-2.2,-0.975) 5(2.2,-0.975) 6(2.2,-0.325) 7(2.2,0.325) 8(2.2,0.975)
  silkscreen extent -1.5,-1.5 1.5,1.5, body extent -2.5,-1.5 2.5,1.5, height 1.1
WQFN20 [mm]
  rrect50% 0.6x0.2 smd mask+0.05: 1(-1.4,0.8) 2(-1.4,0.4) 3(-1.4,0) 4(-1.4,-0.4) 5(-1.4,-0.8) 11(1.4,-0.8) 12(1.4,-0.4) 13(1.4,0) 14(1.4,0.4) 15(1.4,0.8)
  rrect50% 0.2x0.6 smd mask+0.05: 6(-0.8,-1.4) 7(-0.4,-1.4) 8(0,-1.4) 9(0.4,-1.4) 10(0.8,-1.4) 16(0.8,1.4) 17(0.4,1.4) 18(0,1.4) 19(-0.4,1.4) 20(-0.8,1.4)
  rect 1.7x1.7 smd paste+0.05: 21(0,0)
  silkscreen extent -1.5,-1.5 1.5,1.5, body extent -1.5,-1.5 1.5,1.5, height 0.8
XFL4020 [mm]
  rect 0.98x3.4 smd paste-10: 1(-1.185,0) 2(1.185,0)
  silkscreen extent -2.5,-2.5 2.5,2.5, body extent -2.15,-2.17 2.15,2.13, height 2.07
XTAL_3.2X2.5 [mm]
  rect 1.4x1.2 smd: 1(-1.1,-0.8) 2(1.1,-0.8) 3(1.1,0.8) 4(-1.1,0.8)
  silkscreen extent -2.02,-1.63 1.6,1.3, body extent -1.6,-1.25 1.6,1.25, height 0.61